# Altium PCB main_ADC_PCB.PcbDoc (part 1 of 8)
Units mm, origin at the board's own origin, x right, y up, seen from the top; angles counter-clockwise.
Board outline 150 x 100 mm, 4 copper layers (Top Layer, Layer 1, Layer 2, Bottom Layer), stack 1.62 mm thick; 535 components, 354 nets, 1725 pads, 1075 vias.
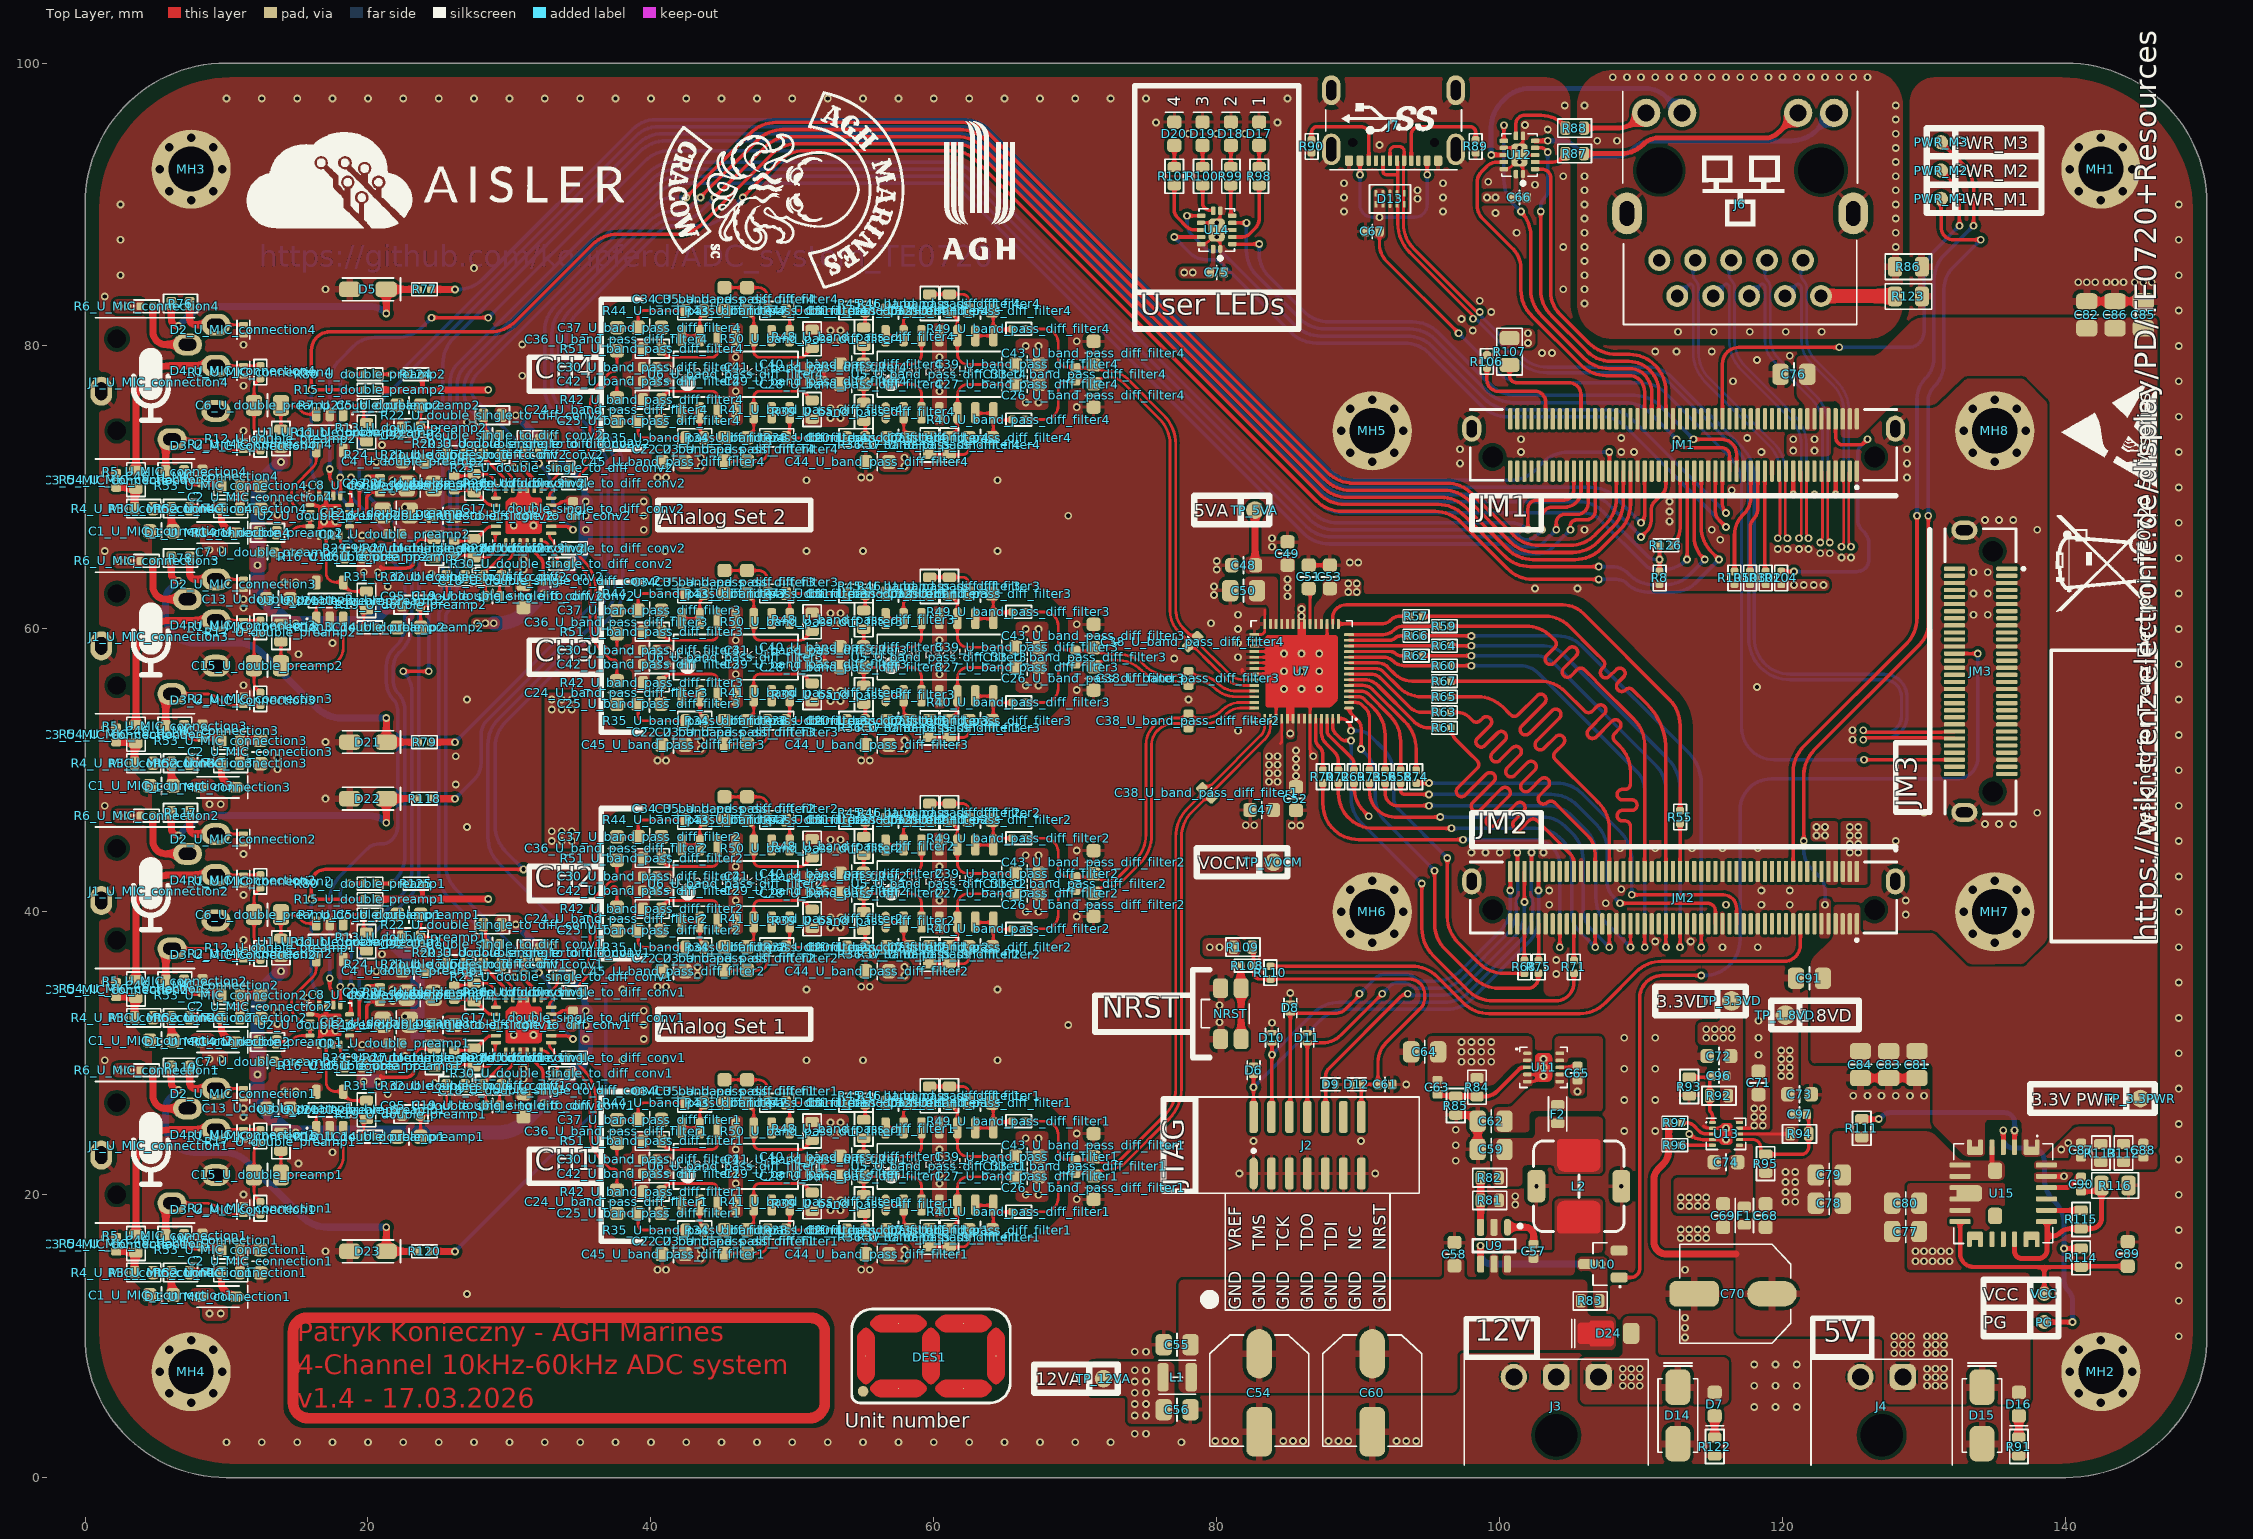
[diagram p0: Top Layer view]
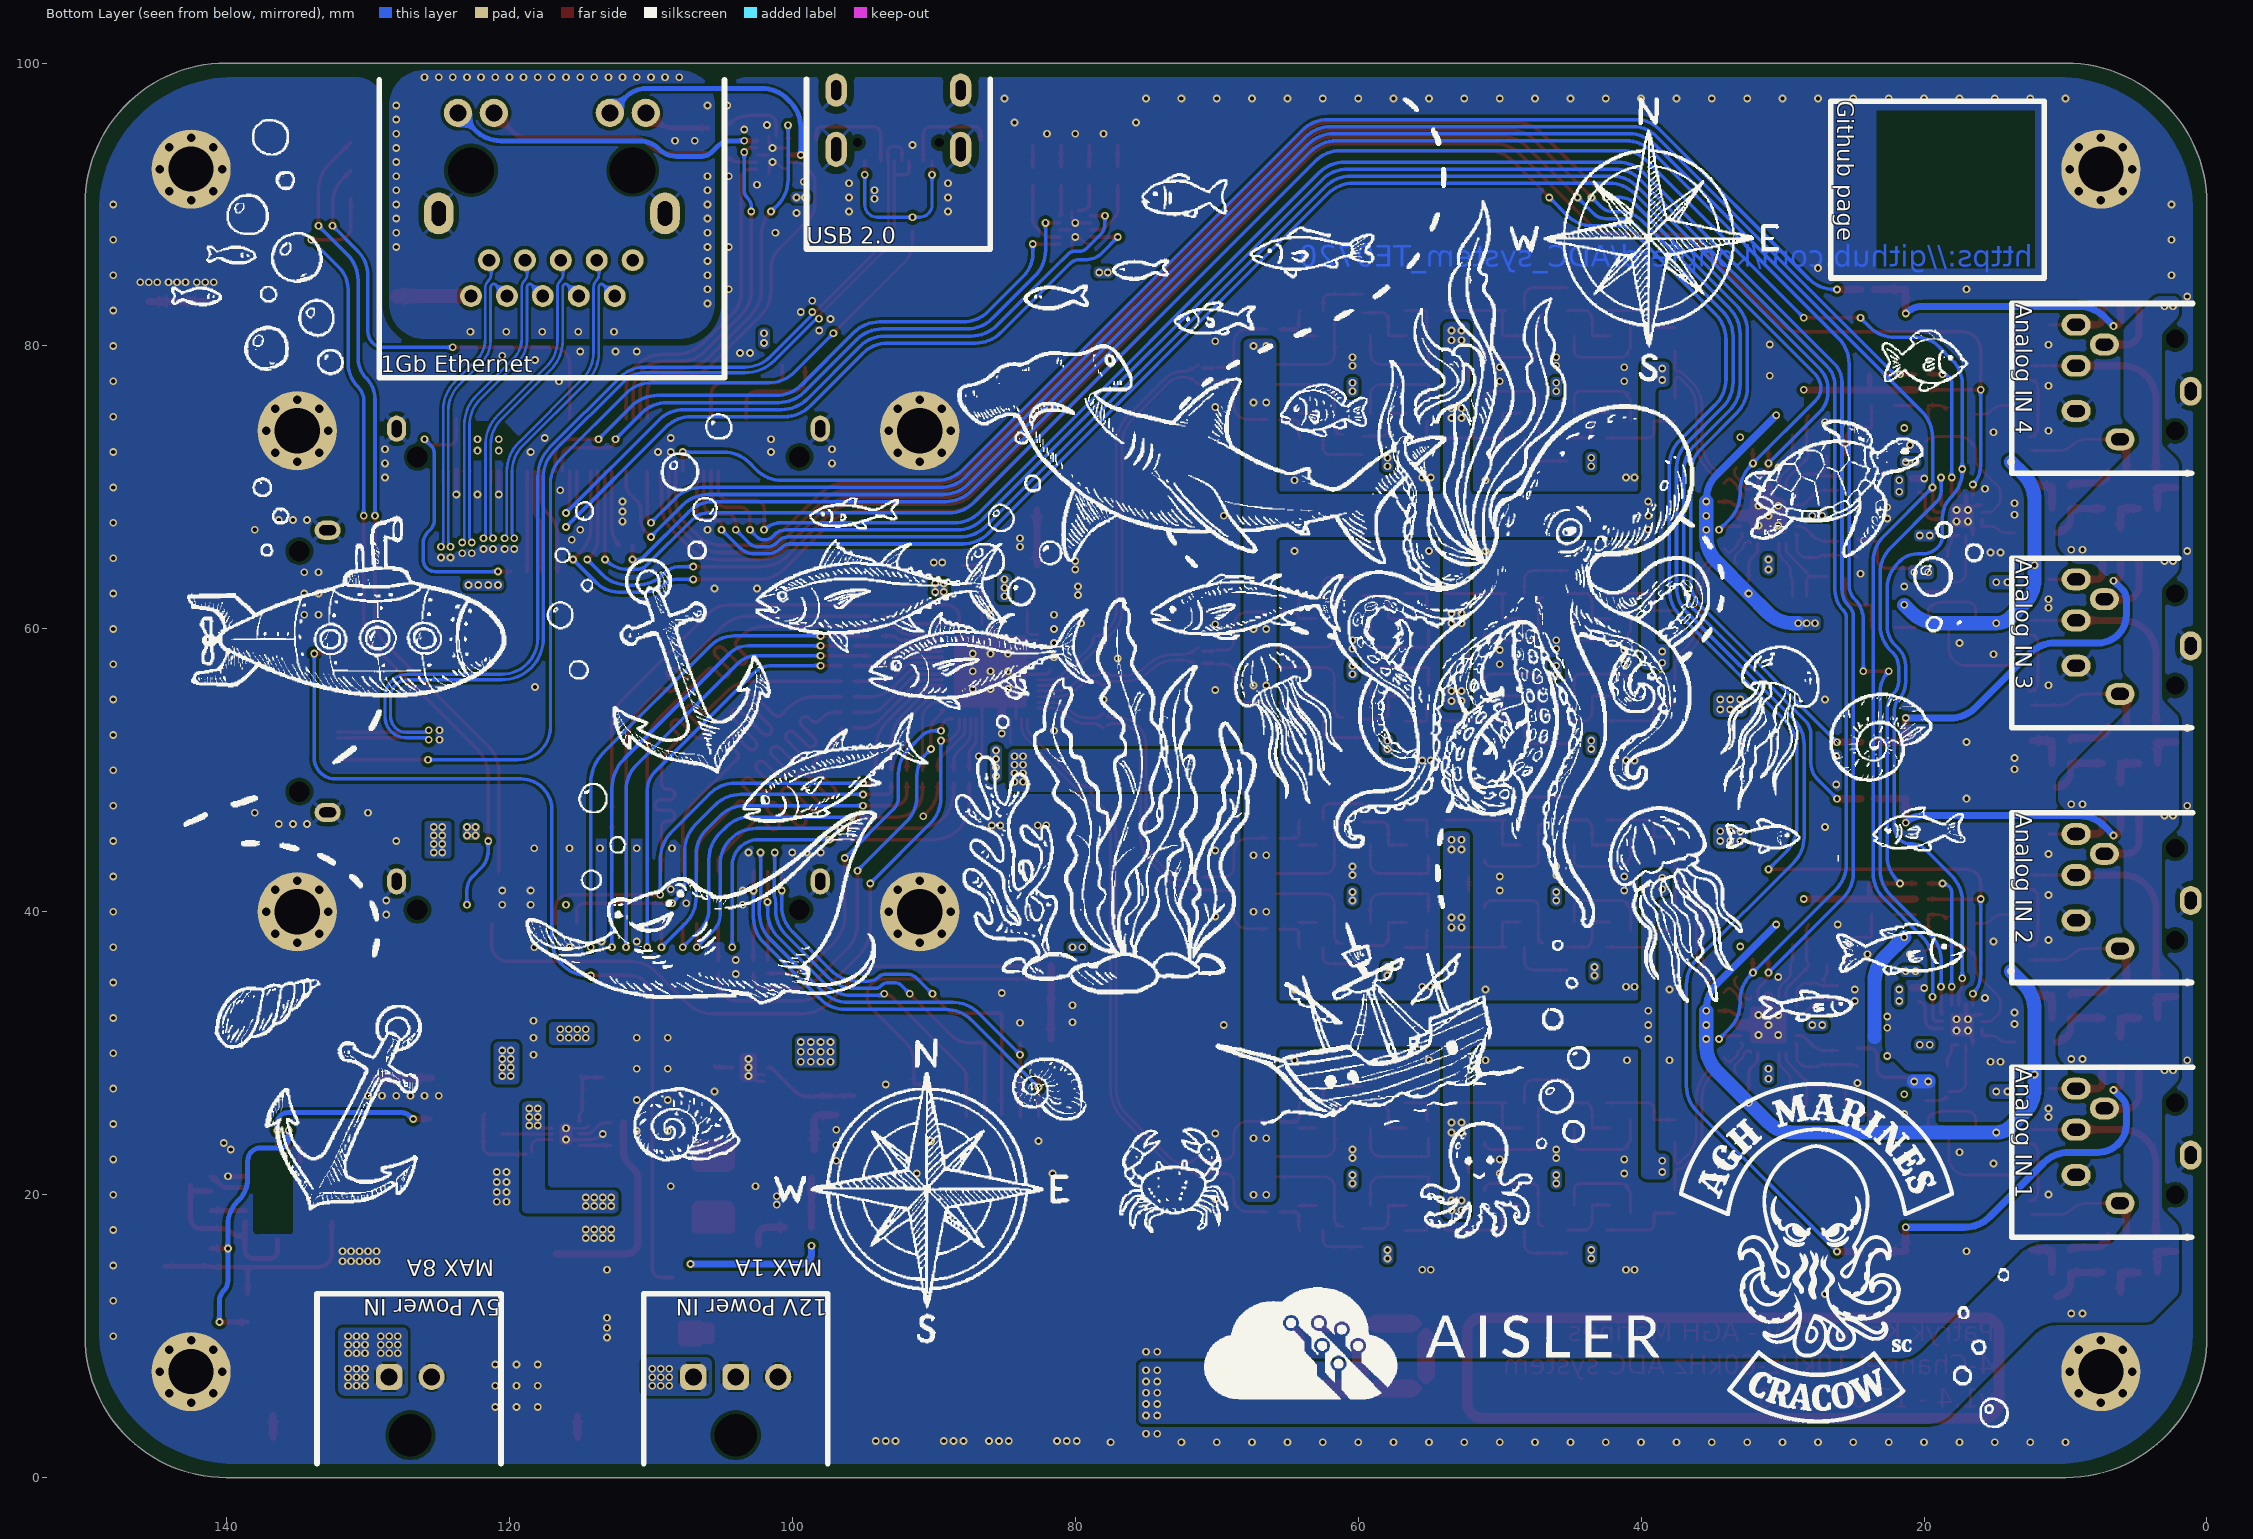
[diagram p1: Bottom Layer view, seen from below]
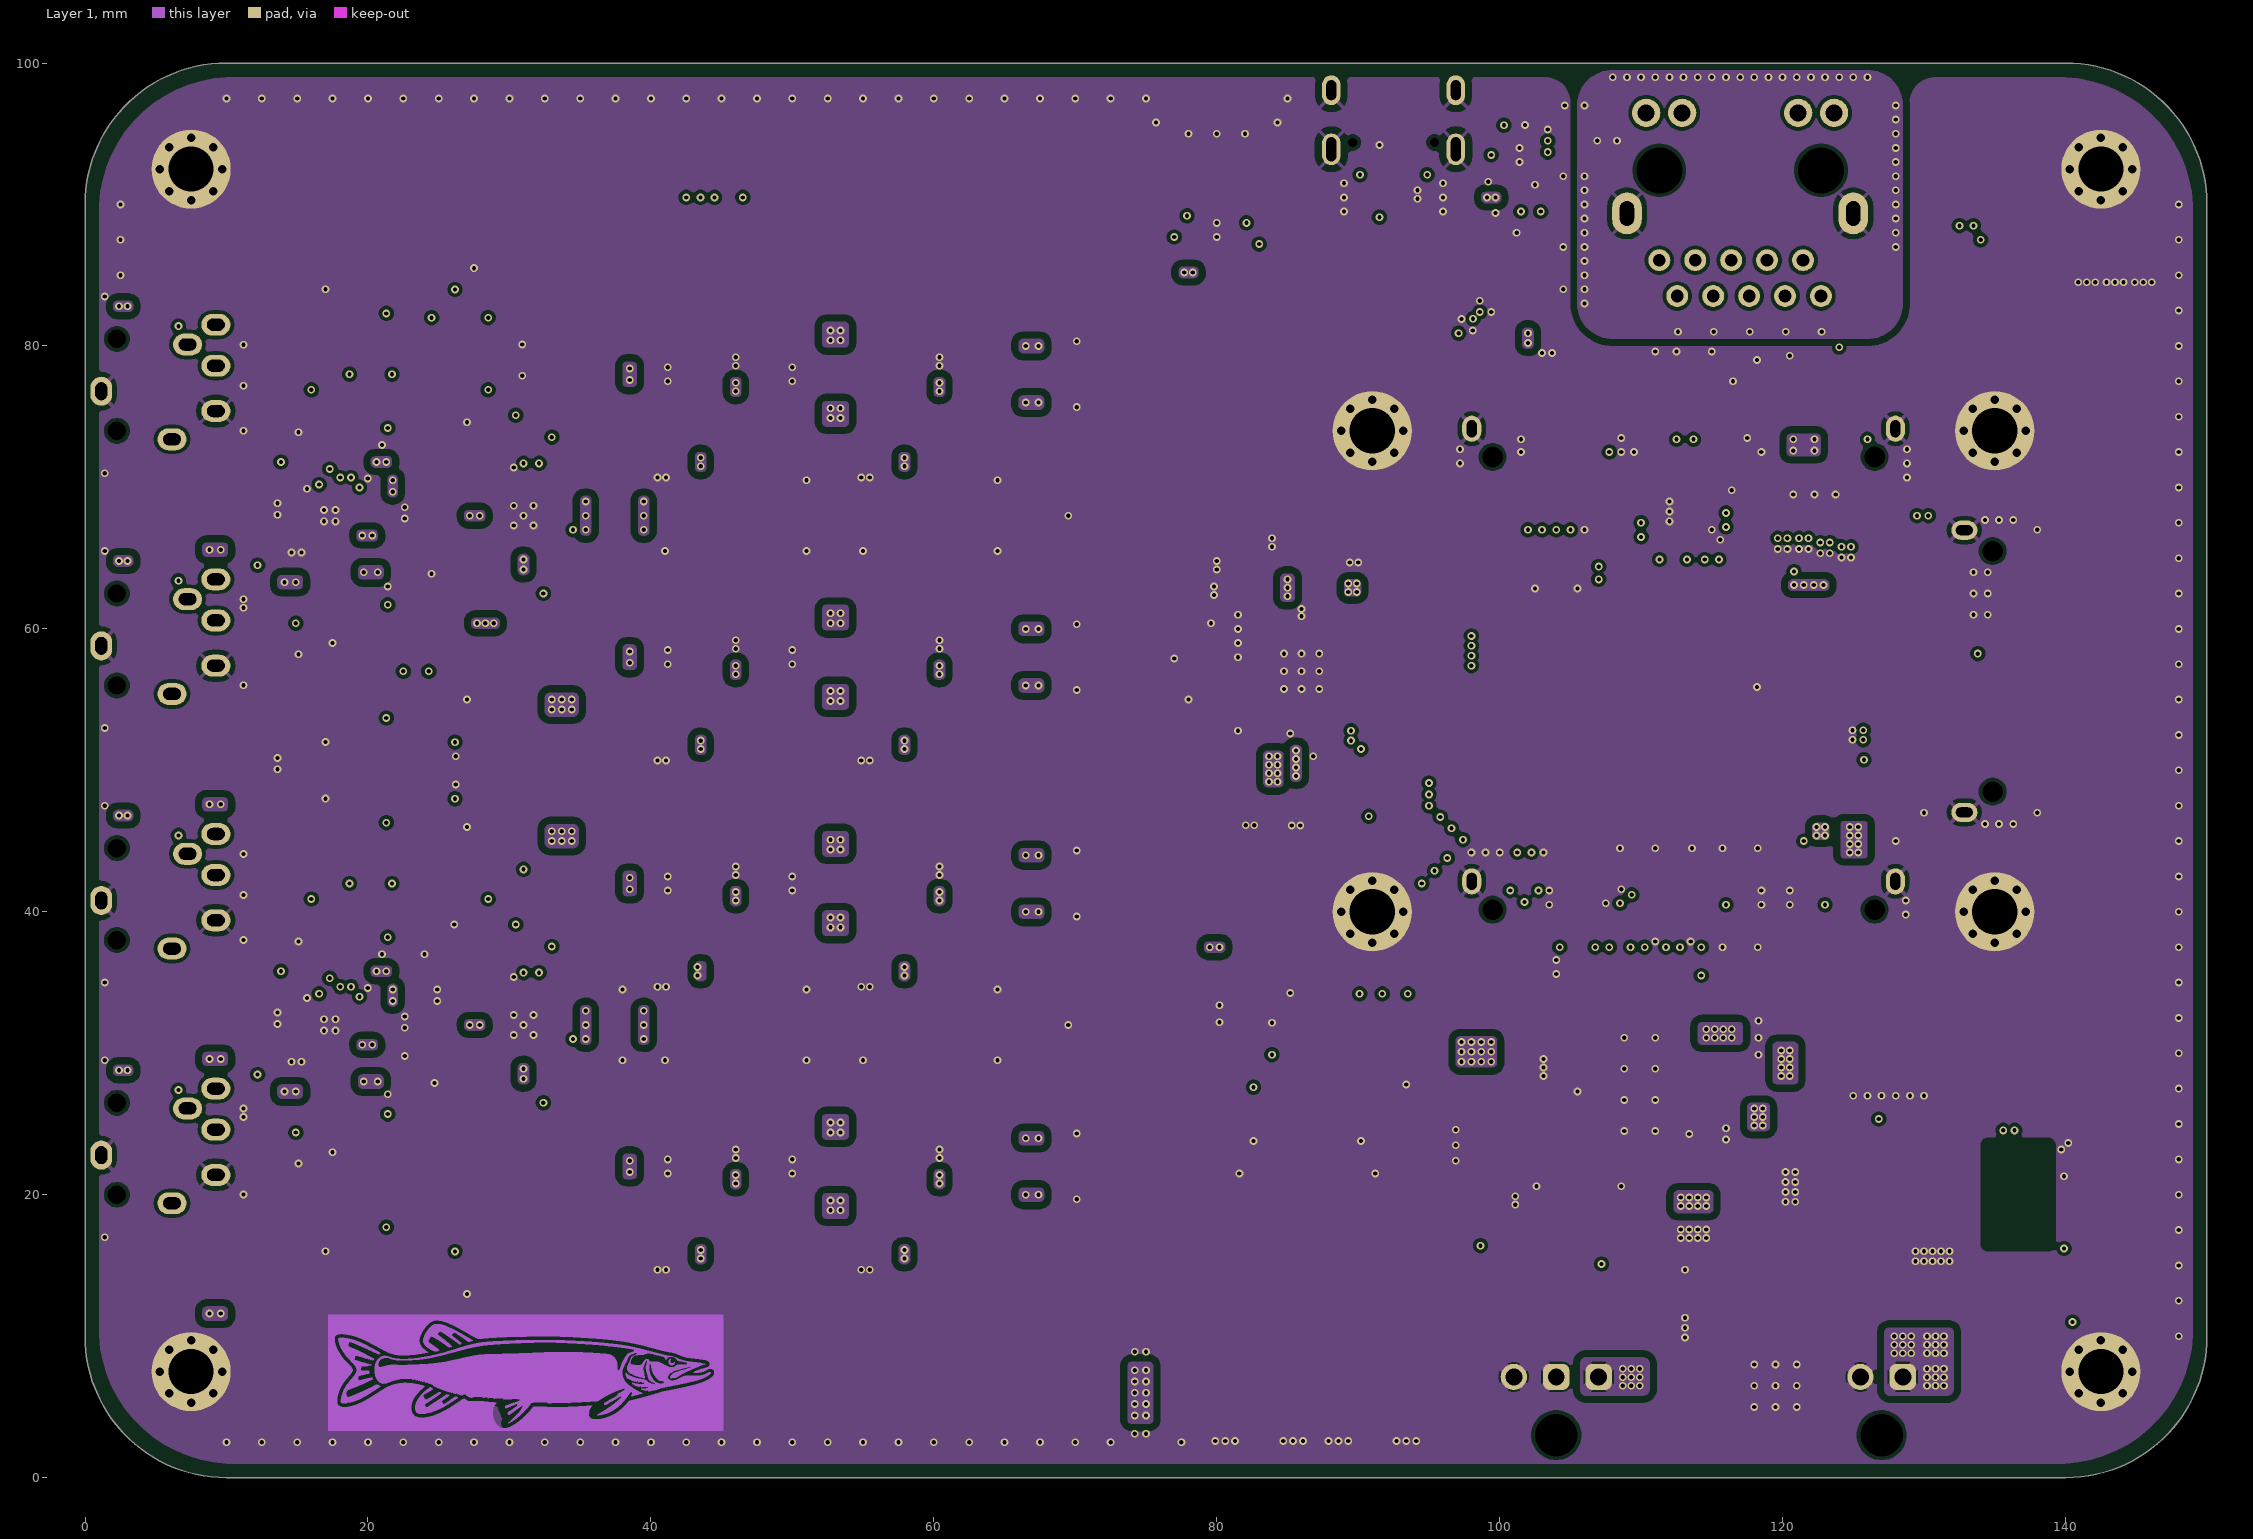
[diagram p2: Layer 1]
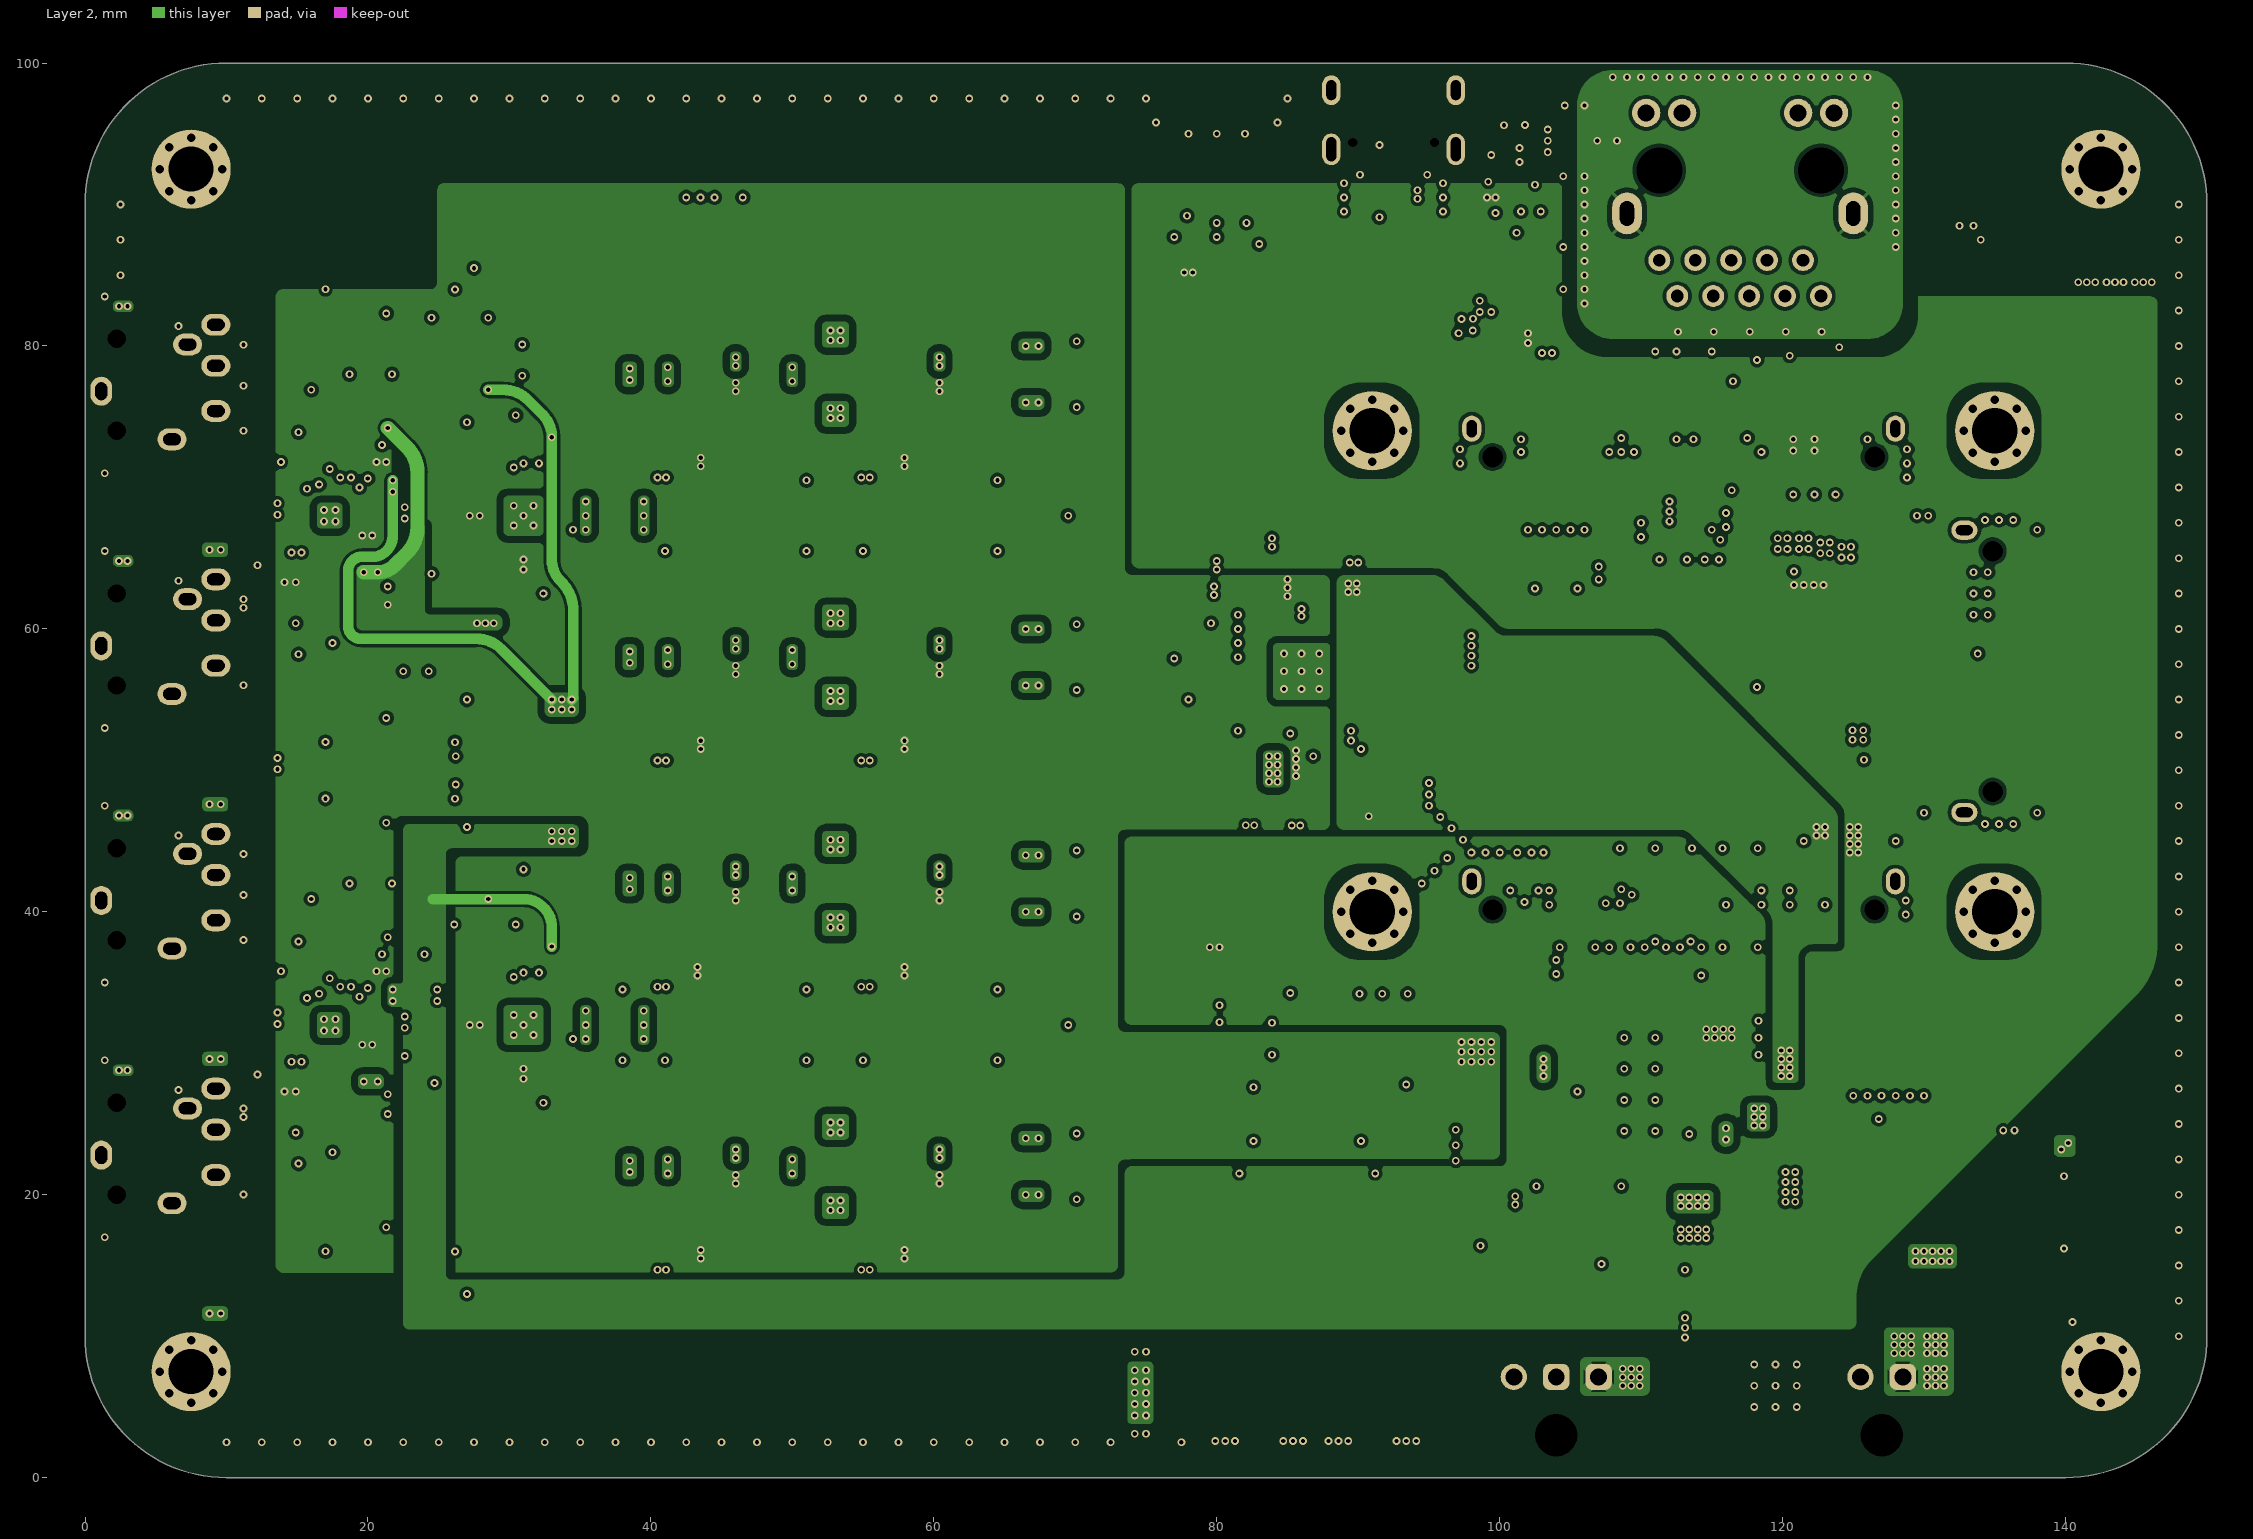
[diagram p3: Layer 2]

## Layer stack, top to bottom
Top Solder: solder mask 0.0102, Solder Resist, Dk 3.5
Top Layer: signal copper 0.035
Dielectric 3: prepreg 0.07, PP-006, Dk 4.15
Dielectric 4: prepreg 0.07, PP-006, Dk 4.15
Layer 1: signal copper 0.035
Core FR4: core 1.2, FR-4, Dk 4.6
Layer 2: signal copper 0.035
Dielectric 5: prepreg 0.07, PP-006, Dk 4.15
Dielectric 6: prepreg 0.07, PP-006, Dk 4.15
Bottom Layer: signal copper 0.035
Bottom Solder: solder mask 0.0102, Solder Resist, Dk 3.5

## Board outline
10,0 cw(c10,10) 0,10 0,90 cw(c10,90) 10,100 140,100 cw(c140,90) 150,90 150,10 cw(c140,10) 140,0

## Design rules (kind name [scope] priority, off if disabled: settings)
Clearance Clearance_1 [OnLayer('Layer 1')] p1: gap=0.125 ignorepadtopadclearanceinfootprint=TRUE except(0.2: Arc-Fill Arc-Poly Arc-Region Track-Fill Track-Poly Track-Region SMDPad-Fill SMDPad-Poly SMDPad-Region; 0.25: Arc-Hole Track-Hole SMDPad-Hole THPad-Fill THPad-Poly THPad-Region THPad-Hole Via-Fill Via-Poly Via-Region Via-Hole Fill-Hole Poly-Hole Region-Hole Text-Hole; 0.5: Fill-Fill Fill-Poly Fill-Region Poly-Poly Poly-Region Region-Region)
Clearance Clearance_2 [OnLayer('Layer 2')] p2: gap=0.125 ignorepadtopadclearanceinfootprint=TRUE except(0.2: Arc-Fill Arc-Poly Arc-Region Track-Fill Track-Poly Track-Region SMDPad-Fill SMDPad-Poly SMDPad-Region; 0.25: Arc-Hole Track-Hole SMDPad-Hole THPad-Fill THPad-Poly THPad-Region THPad-Hole Via-Fill Via-Poly Via-Region Via-Hole Fill-Hole Poly-Hole Region-Hole Text-Hole; 0.5: Fill-Fill Fill-Poly Fill-Region Poly-Poly Poly-Region Region-Region)
Clearance [All] p3: gap=0.125 ignorepadtopadclearanceinfootprint=TRUE except(0.2: Arc-Fill Arc-Poly Arc-Region Track-Fill Track-Poly Track-Region SMDPad-Fill SMDPad-Poly SMDPad-Region Fill-Fill Fill-Poly Fill-Region Poly-Poly Poly-Region Region-Region; 0.25: Arc-Hole Track-Hole SMDPad-Hole THPad-Fill THPad-Poly THPad-Region THPad-Hole Via-Fill Via-Poly Via-Region Via-Hole Fill-Hole Poly-Hole Region-Hole Text-Hole)
ComponentClearance ComponentClearance_Socket [(InComponent('JM1') OR InComponent('JM2') OR InComponent('JM3'))] p1: gap=-1 collisioncheckmode=3 verticalgap=-1 showdistances=FALSE donotcheckwithout3dbody=TRUE
ComponentClearance ComponentClearance_default [All] p2: gap=0.254 collisioncheckmode=3 verticalgap=0.254 showdistances=FALSE donotcheckwithout3dbody=TRUE
DiffPairsRouting DiffPairsRouting_90_Ohm [InDifferentialPairClass('90OhmDiff')] p1: maxlimit=0.165 minlimit=0.127 mostfreqgap=0.165 toplayer_mingap=0.165 toplayer_minwidth=0.23 toplayer_maxwidth=0.23 toplayer_prefwidth=0.23 midlayer1_maxgap=0.127 midlayer1_prefgap=0.127 midlayer1_minwidth=0.1 midlayer1_maxwidth=0.1 midlayer1_prefwidth=0.1 midlayer2_maxgap=0.127 midlayer2_prefgap=0.127 midlayer2_minwidth=0.1 midlayer2_maxwidth=0.1 midlayer2_prefwidth=0.1 bottomlayer_mingap=0.165 bottomlayer_minwidth=0.23 bottomlayer_maxwidth=0.23 bottomlayer_prefwidth=0.23 impedanceprofiledriven=TRUE impedanceprofileid={7FBF8F98-4FFD-4100-BE08-43F94D93FB27} impedanceprofilevalue=90.000000 maxuncoupledlength=12.7
DiffPairsRouting DiffPairsRouting_100_Ohm [InDifferentialPairClass('100OhmDiff')] p2: maxlimit=0.18 minlimit=0.18 mostfreqgap=0.18 toplayer_minwidth=0.19 toplayer_maxwidth=0.19 toplayer_prefwidth=0.19 midlayer1_minwidth=0.1 midlayer1_maxwidth=0.1 midlayer1_prefwidth=0.1 midlayer2_minwidth=0.1 midlayer2_maxwidth=0.1 midlayer2_prefwidth=0.1 bottomlayer_minwidth=0.19 bottomlayer_maxwidth=0.19 bottomlayer_prefwidth=0.19 impedanceprofiledriven=TRUE impedanceprofileid={1AAB0539-07C5-4944-8F13-31C4516DCF1C} impedanceprofilevalue=100.000000 maxuncoupledlength=12.7
DiffPairsRouting [All] p3: maxlimit=0.254 minlimit=0.2 mostfreqgap=0.25 toplayer_minwidth=0.15 toplayer_maxwidth=0.5 toplayer_prefwidth=0.25 midlayer1_minwidth=0.15 midlayer1_maxwidth=0.5 midlayer1_prefwidth=0.25 midlayer2_minwidth=0.15 midlayer2_maxwidth=0.5 midlayer2_prefwidth=0.25 bottomlayer_minwidth=0.15 bottomlayer_maxwidth=0.5 bottomlayer_prefwidth=0.25 maxuncoupledlength=12.7
HoleSize [All] p1: absolutevalues=TRUE maxlimit=6 minlimit=0.025 maxpercent=80.000 minpercent=20.000
HoleToHoleClearance [All] p1: gap=0.125 allowstackedmicrovias=TRUE
MatchedLengths [InxSignalClass('1Gb_Ethernet')] p1: tolerance=1 checknetsindiffpair=FALSE checkdiffpairvsdiffpair=TRUE checkxsignals=TRUE checkothers=TRUE
MatchedLengths MatchedLengths_1 [InxSignalClass('ADC_Sync_Frame')] p2: tolerance=2 checknetsindiffpair=FALSE checkdiffpairvsdiffpair=TRUE checkxsignals=TRUE checkothers=TRUE
MinimumSolderMaskSliver [All] p1: minsoldermaskwidth=0.1
PasteMaskExpansion [All] p1: expansion=-0.035
PlaneClearance [All] p1: clearance=0.5
PlaneConnect [All] p1: pad.planeconnectstyle=Relief pad.reliefexpansion=0.5 pad.reliefentries=4 pad.reliefconductorwidth=0.5 pad.reliefairgap=0.25 via.planeconnectstyle=Direct via.reliefexpansion=0.5 via.reliefentries=4 via.reliefconductorwidth=0.5 via.reliefairgap=0.25
PolygonConnect GND_pour_rule [InNamedPolygon('NONET_L03_P133')] p1: thpad.connectstyle=Relief thpad.reliefconductorwidth=0.5 thpad.reliefentries=4 thpad.polygonreliefangle="90 Angle" thpad.airgapwidth=0.25 smdpad.connectstyle=Relief smdpad.reliefconductorwidth=0.5 smdpad.reliefentries=4 smdpad.polygonreliefangle="90 Angle" smdpad.airgapwidth=0.25 via.connectstyle=Direct via.reliefconductorwidth=0.254 via.reliefentries=4 via.polygonreliefangle="90 Angle" via.airgapwidth=0.254
PolygonConnect [All] p2: thpad.connectstyle=Relief thpad.reliefconductorwidth=0.5 thpad.reliefentries=4 thpad.polygonreliefangle="45 Angle" thpad.airgapwidth=0.25 smdpad.connectstyle=Direct smdpad.reliefconductorwidth=0.5 smdpad.reliefentries=4 smdpad.polygonreliefangle="90 Angle" smdpad.airgapwidth=0.25 via.connectstyle=Direct via.reliefconductorwidth=0.254 via.reliefentries=4 via.polygonreliefangle="90 Angle" via.airgapwidth=0.254
RoutingCorners [All] p1: cornerstyle=Round minsetback=2.5 maxsetback=10
RoutingVias [All] p1: holewidth=0.3 width=0.55 viastyle="Through Hole" minholewidth=0.25 minwidth=0.45 maxholewidth=0.45 maxwidth=0.65
SilkToSilkClearance [All] p1: silktosilkclearance=-1
SilkToSolderMaskClearance [IsPad] p1: minsilkscreentomaskgap=0.125 clearancetoexposedcopper=TRUE
SolderMaskExpansion SolderMaskExpansion_Via [IsVia] p1: expansion=0.102 istentingtop=TRUE
SolderMaskExpansion [All] p2: expansion=0.05 istentingtop=FALSE
SupplyNets "Schematic Supply Nets_11" [InNet('3.3VD')] p1: voltage=0.000
SupplyNets "Schematic Supply Nets_10" [InNet('5VA')] p2: voltage=0.000
SupplyNets "Schematic Supply Nets_9" [InNet('12V_MIC')] p3: voltage=0.000
SupplyNets "Schematic Supply Nets_8" [InNet('1.8VD')] p4: voltage=0.000
SupplyNets "Schematic Supply Nets_7" [InNet('5VIN')] p5: voltage=0.000
SupplyNets "Schematic Supply Nets_6" [InNet('AGND')] p6: voltage=0.000
SupplyNets "Schematic Supply Nets_5" [InNet('VOCM')] p7: voltage=0.000
SupplyNets "Schematic Supply Nets_4" [InNet('ETH_GND')] p8: voltage=0.000
SupplyNets "Schematic Supply Nets_3" [InNet('3.3VPWR')] p9: voltage=0.000
SupplyNets "Schematic Supply Nets_2" [InNet('GND')] p10: voltage=0.000
SupplyNets "Schematic Supply Nets_1" [InNet('12VIN')] p11: voltage=0.000
SupplyNets "Schematic Supply Nets" [InNet('5VD')] p12: voltage=0.000
UnRoutedNet [All] p1: checkbadconnections=TRUE
Width Width_50_Ohm [InNetClass('50OhmSingle')] p1: maxlimit=0.245 minlimit=0.17 preferedwidth=0.245 toplayer_minwidth=0.245 midlayer1_maxwidth=0.17 midlayer1_prefwidth=0.17 midlayer2_maxwidth=0.17 midlayer2_prefwidth=0.17 bottomlayer_minwidth=0.245 impedanceprofiledriven=TRUE impedanceprofileid={6E29DB61-83AF-4A23-B0B3-436B118F7477} impedanceprofilevalue=50.000000 minimp=50.000000 maximp=50.000000 favimp=50.000000
Width Width_default [All] p2: maxlimit=2 minlimit=0.125 preferedwidth=0.25 minimp=50.000000 maximp=50.000000 favimp=50.000000
18 further rules are at their usual default settings.

## Classes and differential pairs
polygon class GND_pours: NONET_L03_P133
differential pair class 100OhmDiff: ETH_D1 ETH_D2 ETH_D3 ETH_D4
differential pair class 90OhmDiff: USB_D
channel class MIC_connection: U_MIC_connection1 U_MIC_connection2 U_MIC_connection3 U_MIC_connection4
channel class double_single_to_diff_conv: U_double_single_to_diff_conv1 U_double_single_to_diff_conv2
channel class double_preamp: U_double_preamp1 U_double_preamp2
channel class band_pass_diff_filter: U_band_pass_diff_filter1 U_band_pass_diff_filter2 U_band_pass_diff_filter3 U_band_pass_diff_filter4
net class 50OhmSingle: CLKIN CLKIN_FPGA CS CS_FPGA DCLK DCLK_FPGA DOUT0 DOUT0_FPGA DOUT1 DOUT1_FPGA DOUT2 DOUT2_FPGA DOUT3 DOUT3_FPGA ERROR ERROR_FPGA FSYNC FSYNC_FPGA IO0 IO0_FPGA IO1 IO1_FPGA IO4 IO4_FPGA IO5 IO5_FPGA IO6 IO6_FPGA IO7 IO7_FPGA JTAG_SRSTn JTAG_TCK JTAG_TDI JTAG_TDO JTAG_TMS JTAG_VREF NetJM2_17 RESET RESET_FPGA SCLK SCLK_FPGA SDI SDI_FPGA SDO SDO_FPGA START START_FPGA
component class U_USB_data: C67 D13 J7 R89 R90
component class U_switch_isolation: D5 D21 D22 D23 R76 R77 R78 R79 R117 R118 R119 R120
component class U_signal_processing_assembly: R8 R124 R125 R126
component class U_power_management: C71 C72 C73 C74 C96 C97 R92 R93 R94 R95 R96 R97 TP_1.8VD TP_3.3VD U13
component class U_Power_connectors: C68 C69 C70 D14 D15 D16 F1 J3 J4 R91
component class U_MIC_connection4: C1_U_MIC_connection4 C2_U_MIC_connection4 C3_U_MIC_connection4 C46_U_MIC_connection4 D1_U_MIC_connection4 D2_U_MIC_connection4 D3_U_MIC_connection4 D4_U_MIC_connection4 J1_U_MIC_connection4 R1_U_MIC_connection4 R2_U_MIC_connection4 R3_U_MIC_connection4 R4_U_MIC_connection4 R5_U_MIC_connection4 R6_U_MIC_connection4 R52_U_MIC_connection4 R53_U_MIC_connection4 R54_U_MIC_connection4
component class U_MIC_connection3: C1_U_MIC_connection3 C2_U_MIC_connection3 C3_U_MIC_connection3 C46_U_MIC_connection3 D1_U_MIC_connection3 D2_U_MIC_connection3 D3_U_MIC_connection3 D4_U_MIC_connection3 J1_U_MIC_connection3 R1_U_MIC_connection3 R2_U_MIC_connection3 R3_U_MIC_connection3 R4_U_MIC_connection3 R5_U_MIC_connection3 R6_U_MIC_connection3 R52_U_MIC_connection3 R53_U_MIC_connection3 R54_U_MIC_connection3
component class U_MIC_connection2: C1_U_MIC_connection2 C2_U_MIC_connection2 C3_U_MIC_connection2 C46_U_MIC_connection2 D1_U_MIC_connection2 D2_U_MIC_connection2 D3_U_MIC_connection2 D4_U_MIC_connection2 J1_U_MIC_connection2 R1_U_MIC_connection2 R2_U_MIC_connection2 R3_U_MIC_connection2 R4_U_MIC_connection2 R5_U_MIC_connection2 R6_U_MIC_connection2 R52_U_MIC_connection2 R53_U_MIC_connection2 R54_U_MIC_connection2
component class U_MIC_connection1: C1_U_MIC_connection1 C2_U_MIC_connection1 C3_U_MIC_connection1 C46_U_MIC_connection1 D1_U_MIC_connection1 D2_U_MIC_connection1 D3_U_MIC_connection1 D4_U_MIC_connection1 J1_U_MIC_connection1 R1_U_MIC_connection1 R2_U_MIC_connection1 R3_U_MIC_connection1 R4_U_MIC_connection1 R5_U_MIC_connection1 R6_U_MIC_connection1 R52_U_MIC_connection1 R53_U_MIC_connection1 R54_U_MIC_connection1
component class U_JTAG: C61 D6 D8 D9 D10 D11 D12 J2 NRST R108 R109 R110
component class U_FPGA_board_conn_pt3: JM3
component class U_FPGA_board_conn_pt2: C91 JM2 PWR_M1 PWR_M3
component class U_FPGA_board_conn_pt1: C76 JM1 PWR_M2 R102 R103 R104 R105 R106 R107
component class U_features: C75 D17 D18 D19 D20 R98 R99 R100 R101 U14
component class U_Ethernet: C66 J6 R86 R87 R88 R123 U12
component class U_double_single_to_diff_conv2: C16_U_double_single_to_diff_conv2 C17_U_double_single_to_diff_conv2 C18_U_double_single_to_diff_conv2 C19_U_double_single_to_diff_conv2 C92_U_double_single_to_diff_conv2 C93_U_double_single_to_diff_conv2 C94_U_double_single_to_diff_conv2 C95_U_double_single_to_diff_conv2 R20_U_double_single_to_diff_conv2 R21_U_double_single_to_diff_conv2 R22_U_double_single_to_diff_conv2 R23_U_double_single_to_diff_conv2 R24_U_double_single_to_diff_conv2 R25_U_double_single_to_diff_conv2 R26_U_double_single_to_diff_conv2 R27_U_double_single_to_diff_conv2 R28_U_double_single_to_diff_conv2 R29_U_double_single_to_diff_conv2 R30_U_double_single_to_diff_conv2 R31_U_double_single_to_diff_conv2 R32_U_double_single_to_diff_conv2 R33_U_double_single_to_diff_conv2 U4_U_double_single_to_diff_conv2
component class U_double_single_to_diff_conv1: C16_U_double_single_to_diff_conv1 C17_U_double_single_to_diff_conv1 C18_U_double_single_to_diff_conv1 C19_U_double_single_to_diff_conv1 C92_U_double_single_to_diff_conv1 C93_U_double_single_to_diff_conv1 C94_U_double_single_to_diff_conv1 C95_U_double_single_to_diff_conv1 R20_U_double_single_to_diff_conv1 R21_U_double_single_to_diff_conv1 R22_U_double_single_to_diff_conv1 R23_U_double_single_to_diff_conv1 R24_U_double_single_to_diff_conv1 R25_U_double_single_to_diff_conv1 R26_U_double_single_to_diff_conv1 R27_U_double_single_to_diff_conv1 R28_U_double_single_to_diff_conv1 R29_U_double_single_to_diff_conv1 R30_U_double_single_to_diff_conv1 R31_U_double_single_to_diff_conv1 R32_U_double_single_to_diff_conv1 R33_U_double_single_to_diff_conv1 U4_U_double_single_to_diff_conv1
component class U_double_preamp2: C4_U_double_preamp2 C5_U_double_preamp2 C6_U_double_preamp2 C7_U_double_preamp2 C8_U_double_preamp2 C9_U_double_preamp2 C10_U_double_preamp2 C11_U_double_preamp2 C12_U_double_preamp2 C13_U_double_preamp2 C14_U_double_preamp2 C15_U_double_preamp2 R7_U_double_preamp2 R11_U_double_preamp2 R12_U_double_preamp2 R13_U_double_preamp2 R14_U_double_preamp2 R15_U_double_preamp2 R16_U_double_preamp2 R17_U_double_preamp2 R18_U_double_preamp2 R19_U_double_preamp2 R80_U_double_preamp2 R121_U_double_preamp2 U1_U_double_preamp2 U2_U_double_preamp2 U3_U_double_preamp2
component class U_double_preamp1: C4_U_double_preamp1 C5_U_double_preamp1 C6_U_double_preamp1 C7_U_double_preamp1 C8_U_double_preamp1 C9_U_double_preamp1 C10_U_double_preamp1 C11_U_double_preamp1 C12_U_double_preamp1 C13_U_double_preamp1 C14_U_double_preamp1 C15_U_double_preamp1 R7_U_double_preamp1 R11_U_double_preamp1 R12_U_double_preamp1 R13_U_double_preamp1 R14_U_double_preamp1 R15_U_double_preamp1 R16_U_double_preamp1 R17_U_double_preamp1 R18_U_double_preamp1 R19_U_double_preamp1 R80_U_double_preamp1 R121_U_double_preamp1 U1_U_double_preamp1 U2_U_double_preamp1 U3_U_double_preamp1
component class U_Bulk_power_converter: C77 C78 C79 C80 C81 C82 C83 C84 C85 C86 C87 C88 C89 C90 PG R111 R112 R113 R114 R115 R116 TP_3.3PWR U15 VCC
component class U_band_pass_diff_filter4: C20_U_band_pass_diff_filter4 C21_U_band_pass_diff_filter4 C22_U_band_pass_diff_filter4 C23_U_band_pass_diff_filter4 C24_U_band_pass_diff_filter4 C25_U_band_pass_diff_filter4 C26_U_band_pass_diff_filter4 C27_U_band_pass_diff_filter4 C28_U_band_pass_diff_filter4 C29_U_band_pass_diff_filter4 C30_U_band_pass_diff_filter4 C31_U_band_pass_diff_filter4 C32_U_band_pass_diff_filter4 C33_U_band_pass_diff_filter4 C34_U_band_pass_diff_filter4 C35_U_band_pass_diff_filter4 C36_U_band_pass_diff_filter4 C37_U_band_pass_diff_filter4 C38_U_band_pass_diff_filter4 C39_U_band_pass_diff_filter4 C40_U_band_pass_diff_filter4 C41_U_band_pass_diff_filter4 C42_U_band_pass_diff_filter4 C43_U_band_pass_diff_filter4 C44_U_band_pass_diff_filter4 C45_U_band_pass_diff_filter4 R34_U_band_pass_diff_filter4 R35_U_band_pass_diff_filter4 R36_U_band_pass_diff_filter4 R37_U_band_pass_diff_filter4 R38_U_band_pass_diff_filter4 R39_U_band_pass_diff_filter4 R40_U_band_pass_diff_filter4 R41_U_band_pass_diff_filter4 R42_U_band_pass_diff_filter4 R43_U_band_pass_diff_filter4 R44_U_band_pass_diff_filter4 R45_U_band_pass_diff_filter4 R46_U_band_pass_diff_filter4 R47_U_band_pass_diff_filter4 R48_U_band_pass_diff_filter4 R49_U_band_pass_diff_filter4 R50_U_band_pass_diff_filter4 R51_U_band_pass_diff_filter4 U5_U_band_pass_diff_filter4 U6_U_band_pass_diff_filter4
component class U_band_pass_diff_filter3: C20_U_band_pass_diff_filter3 C21_U_band_pass_diff_filter3 C22_U_band_pass_diff_filter3 C23_U_band_pass_diff_filter3 C24_U_band_pass_diff_filter3 C25_U_band_pass_diff_filter3 C26_U_band_pass_diff_filter3 C27_U_band_pass_diff_filter3 C28_U_band_pass_diff_filter3 C29_U_band_pass_diff_filter3 C30_U_band_pass_diff_filter3 C31_U_band_pass_diff_filter3 C32_U_band_pass_diff_filter3 C33_U_band_pass_diff_filter3 C34_U_band_pass_diff_filter3 C35_U_band_pass_diff_filter3 C36_U_band_pass_diff_filter3 C37_U_band_pass_diff_filter3 C38_U_band_pass_diff_filter3 C39_U_band_pass_diff_filter3 C40_U_band_pass_diff_filter3 C41_U_band_pass_diff_filter3 C42_U_band_pass_diff_filter3 C43_U_band_pass_diff_filter3 C44_U_band_pass_diff_filter3 C45_U_band_pass_diff_filter3 R34_U_band_pass_diff_filter3 R35_U_band_pass_diff_filter3 R36_U_band_pass_diff_filter3 R37_U_band_pass_diff_filter3 R38_U_band_pass_diff_filter3 R39_U_band_pass_diff_filter3 R40_U_band_pass_diff_filter3 R41_U_band_pass_diff_filter3 R42_U_band_pass_diff_filter3 R43_U_band_pass_diff_filter3 R44_U_band_pass_diff_filter3 R45_U_band_pass_diff_filter3 R46_U_band_pass_diff_filter3 R47_U_band_pass_diff_filter3 R48_U_band_pass_diff_filter3 R49_U_band_pass_diff_filter3 R50_U_band_pass_diff_filter3 R51_U_band_pass_diff_filter3 U5_U_band_pass_diff_filter3 U6_U_band_pass_diff_filter3
component class U_band_pass_diff_filter2: C20_U_band_pass_diff_filter2 C21_U_band_pass_diff_filter2 C22_U_band_pass_diff_filter2 C23_U_band_pass_diff_filter2 C24_U_band_pass_diff_filter2 C25_U_band_pass_diff_filter2 C26_U_band_pass_diff_filter2 C27_U_band_pass_diff_filter2 C28_U_band_pass_diff_filter2 C29_U_band_pass_diff_filter2 C30_U_band_pass_diff_filter2 C31_U_band_pass_diff_filter2 C32_U_band_pass_diff_filter2 C33_U_band_pass_diff_filter2 C34_U_band_pass_diff_filter2 C35_U_band_pass_diff_filter2 C36_U_band_pass_diff_filter2 C37_U_band_pass_diff_filter2 C38_U_band_pass_diff_filter2 C39_U_band_pass_diff_filter2 C40_U_band_pass_diff_filter2 C41_U_band_pass_diff_filter2 C42_U_band_pass_diff_filter2 C43_U_band_pass_diff_filter2 C44_U_band_pass_diff_filter2 C45_U_band_pass_diff_filter2 R34_U_band_pass_diff_filter2 R35_U_band_pass_diff_filter2 R36_U_band_pass_diff_filter2 R37_U_band_pass_diff_filter2 R38_U_band_pass_diff_filter2 R39_U_band_pass_diff_filter2 R40_U_band_pass_diff_filter2 R41_U_band_pass_diff_filter2 R42_U_band_pass_diff_filter2 R43_U_band_pass_diff_filter2 R44_U_band_pass_diff_filter2 R45_U_band_pass_diff_filter2 R46_U_band_pass_diff_filter2 R47_U_band_pass_diff_filter2 R48_U_band_pass_diff_filter2 R49_U_band_pass_diff_filter2 R50_U_band_pass_diff_filter2 R51_U_band_pass_diff_filter2 U5_U_band_pass_diff_filter2 U6_U_band_pass_diff_filter2
component class U_band_pass_diff_filter1: C20_U_band_pass_diff_filter1 C21_U_band_pass_diff_filter1 C22_U_band_pass_diff_filter1 C23_U_band_pass_diff_filter1 C24_U_band_pass_diff_filter1 C25_U_band_pass_diff_filter1 C26_U_band_pass_diff_filter1 C27_U_band_pass_diff_filter1 C28_U_band_pass_diff_filter1 C29_U_band_pass_diff_filter1 C30_U_band_pass_diff_filter1 C31_U_band_pass_diff_filter1 C32_U_band_pass_diff_filter1 C33_U_band_pass_diff_filter1 C34_U_band_pass_diff_filter1 C35_U_band_pass_diff_filter1 C36_U_band_pass_diff_filter1 C37_U_band_pass_diff_filter1 C38_U_band_pass_diff_filter1 C39_U_band_pass_diff_filter1 C40_U_band_pass_diff_filter1 C41_U_band_pass_diff_filter1 C42_U_band_pass_diff_filter1 C43_U_band_pass_diff_filter1 C44_U_band_pass_diff_filter1 C45_U_band_pass_diff_filter1 R34_U_band_pass_diff_filter1 R35_U_band_pass_diff_filter1 R36_U_band_pass_diff_filter1 R37_U_band_pass_diff_filter1 R38_U_band_pass_diff_filter1 R39_U_band_pass_diff_filter1 R40_U_band_pass_diff_filter1 R41_U_band_pass_diff_filter1 R42_U_band_pass_diff_filter1 R43_U_band_pass_diff_filter1 R44_U_band_pass_diff_filter1 R45_U_band_pass_diff_filter1 R46_U_band_pass_diff_filter1 R47_U_band_pass_diff_filter1 R48_U_band_pass_diff_filter1 R49_U_band_pass_diff_filter1 R50_U_band_pass_diff_filter1 R51_U_band_pass_diff_filter1 U5_U_band_pass_diff_filter1 U6_U_band_pass_diff_filter1
component class U_analog_power: C54 C55 C56 C57 C58 C59 C60 C62 C63 C64 C65 D7 D24 F2 L1 L2 R81 R82 R83 R84 R85 R122 TP_5VA TP_12VA U9 U10 U11
component class U_ADC: C47 C48 C49 C50 C51 C52 C53 R55 R56 R57 R58 R59 R60 R61 R62 R63 R64 R65 R66 R67 R68 R69 R70 R71 R72 R73 R74 R75 TP_VOCM U7
component class top_assembly: DES1 MH1 MH2 MH3 MH4 MH5 MH6 MH7 MH8
differential pair USB_D: +USB_D_P -USB_D_N
differential pair MIC_FILTER_OUT_U_band_pass_diff_filter4: +MIC_FILTER_OUT_U_band_pass_diff_filter4_P -MIC_FILTER_OUT_U_band_pass_diff_filter4_N
differential pair MIC_FILTER_OUT_U_band_pass_diff_filter3: +MIC_FILTER_OUT_U_band_pass_diff_filter3_P -MIC_FILTER_OUT_U_band_pass_diff_filter3_N
differential pair MIC_FILTER_OUT_U_band_pass_diff_filter2: +MIC_FILTER_OUT_U_band_pass_diff_filter2_P -MIC_FILTER_OUT_U_band_pass_diff_filter2_N
differential pair MIC_FILTER_OUT_U_band_pass_diff_filter1: +MIC_FILTER_OUT_U_band_pass_diff_filter1_P -MIC_FILTER_OUT_U_band_pass_diff_filter1_N
differential pair MIC2_DIFF_U_double_single_to_diff_conv2: +MIC2_DIFF_U_double_single_to_diff_conv2_P -MIC2_DIFF_U_double_single_to_diff_conv2_N
differential pair MIC2_DIFF_U_double_single_to_diff_conv1: +MIC2_DIFF_U_double_single_to_diff_conv1_P -MIC2_DIFF_U_double_single_to_diff_conv1_N
differential pair MIC2_DIFF_R_U_double_single_to_diff_conv2: +MIC2_DIFF_R_U_double_single_to_diff_conv2_P -MIC2_DIFF_R_U_double_single_to_diff_conv2_N
differential pair MIC2_DIFF_R_U_double_single_to_diff_conv1: +MIC2_DIFF_R_U_double_single_to_diff_conv1_P -MIC2_DIFF_R_U_double_single_to_diff_conv1_N
differential pair MIC1_DIFF_U_double_single_to_diff_conv2: +MIC1_DIFF_U_double_single_to_diff_conv2_P -MIC1_DIFF_U_double_single_to_diff_conv2_N
differential pair MIC1_DIFF_U_double_single_to_diff_conv1: +MIC1_DIFF_U_double_single_to_diff_conv1_P -MIC1_DIFF_U_double_single_to_diff_conv1_N
differential pair MIC1_DIFF_R_U_double_single_to_diff_conv2: +MIC1_DIFF_R_U_double_single_to_diff_conv2_P -MIC1_DIFF_R_U_double_single_to_diff_conv2_N
differential pair MIC1_DIFF_R_U_double_single_to_diff_conv1: +MIC1_DIFF_R_U_double_single_to_diff_conv1_P -MIC1_DIFF_R_U_double_single_to_diff_conv1_N
differential pair ETH_D4: +ETH_D4_P -ETH_D4_N
differential pair ETH_D3: +ETH_D3_P -ETH_D3_N
differential pair ETH_D2: +ETH_D2_P -ETH_D2_N
differential pair ETH_D1: +ETH_D1_P -ETH_D1_N

## Components (designator, comment, footprint, x,y, rotation, side; value= is the part's Value field where it differs from the comment)
C1_U_MIC_connection1 "CC0603JRX7R7BB105" CAPC_0603#1 5.4,12.9 r0 top value=1uF (schematic designator C1)
C1_U_MIC_connection2 "CC0603JRX7R7BB105" CAPC_0603#1 5.4,30.9 r0 top value=1uF (schematic designator C1)
C1_U_MIC_connection3 "CC0603JRX7R7BB105" CAPC_0603#1 5.4,48.9 r0 top value=1uF (schematic designator C1)
C1_U_MIC_connection4 "CC0603JRX7R7BB105" CAPC_0603#1 5.4,66.9 r0 top value=1uF (schematic designator C1)
C2_U_MIC_connection1 "CC0603JRX7R7BB105" CAPC_0603#1 12.4,15.3 r90 top value=1uF (schematic designator C2)
C2_U_MIC_connection2 "CC0603JRX7R7BB105" CAPC_0603#1 12.4,33.3 r90 top value=1uF (schematic designator C2)
C2_U_MIC_connection3 "CC0603JRX7R7BB105" CAPC_0603#1 12.4,51.3 r90 top value=1uF (schematic designator C2)
C2_U_MIC_connection4 "CC0603JRX7R7BB105" CAPC_0603#1 12.4,69.3 r90 top value=1uF (schematic designator C2)
C3_U_MIC_connection1 "KGM05ACG1H101FH" CAPC_0402 2.2,16.5 r90 top value=100pF (schematic designator C3)
C3_U_MIC_connection2 "KGM05ACG1H101FH" CAPC_0402 2.2,34.5 r90 top value=100pF (schematic designator C3)
C3_U_MIC_connection3 "KGM05ACG1H101FH" CAPC_0402 2.2,52.5 r90 top value=100pF (schematic designator C3)
C3_U_MIC_connection4 "KGM05ACG1H101FH" CAPC_0402 2.2,70.5 r90 top value=100pF (schematic designator C3)
C4_U_double_preamp1 "CC0603JRX7R7BB105" CAPC_0603#1 23.252,35.85 r0 top value=1uF (schematic designator C4)
C4_U_double_preamp2 "CC0603JRX7R7BB105" CAPC_0603#1 23.252,71.85 r0 top value=1uF (schematic designator C4)
C5_U_double_preamp1 "CC0603JRX7R7BB105" CAPC_0603#1 22.9,39.8 r180 top value=1uF (schematic designator C5)
C5_U_double_preamp2 "CC0603JRX7R7BB105" CAPC_0603#1 22.9,75.8 r180 top value=1uF (schematic designator C5)
C6_U_double_preamp1 "EMK212BJ106KG-T" CAPC_0805 12.9,39.8 r180 top value=10uF (schematic designator C6)
C6_U_double_preamp2 "EMK212BJ106KG-T" CAPC_0805 12.9,75.8 r180 top value=10uF (schematic designator C6)
C7_U_double_preamp1 "MSAST105SB5104MFNA01" CAPC_0402 12.9,29.4 r0 top value=0.1uF (schematic designator C7)
C7_U_double_preamp2 "MSAST105SB5104MFNA01" CAPC_0402 12.9,65.4 r0 top value=0.1uF (schematic designator C7)
C8_U_double_preamp1 "MSAST105SB5104MFNA01" CAPC_0402 20.852,34.15 r270 top value=0.1uF (schematic designator C8)
C8_U_double_preamp2 "MSAST105SB5104MFNA01" CAPC_0402 20.852,70.15 r270 top value=0.1uF (schematic designator C8)
C9_U_double_preamp1 "EMK212BJ106KG-T" CAPC_0805 23.7,34.1 r180 top value=10uF (schematic designator C9)
C9_U_double_preamp2 "EMK212BJ106KG-T" CAPC_0805 23.7,70.1 r180 top value=10uF (schematic designator C9)
C10_U_double_preamp1 "MSAST105SB5104MFNA01" CAPC_0402 21.3,29.1 r0 top value=0.1uF (schematic designator C10)
C10_U_double_preamp2 "MSAST105SB5104MFNA01" CAPC_0402 21.3,65.1 r0 top value=0.1uF (schematic designator C10)
C11_U_double_preamp1 "MSAST105SB5104MFNA01" CAPC_0402 21.9,30.7 r0 top value=0.1uF (schematic designator C11)
C11_U_double_preamp2 "MSAST105SB5104MFNA01" CAPC_0402 21.9,66.7 r0 top value=0.1uF (schematic designator C11)
C12_U_double_preamp1 "EMK212BJ106KG-T" CAPC_0805 22,32.2 r0 top value=10uF (schematic designator C12)
C12_U_double_preamp2 "EMK212BJ106KG-T" CAPC_0805 22,68.2 r0 top value=10uF (schematic designator C12)
C13_U_double_preamp1 "CC0603JRX7R7BB105" CAPC_0603#1 13.675,26.1 r180 top value=1uF (schematic designator C13)
C13_U_double_preamp2 "CC0603JRX7R7BB105" CAPC_0603#1 13.675,62.1 r180 top value=1uF (schematic designator C13)
C14_U_double_preamp1 "CC0603JRX7R7BB105" CAPC_0603#1 22.9,24.1 r180 top value=1uF (schematic designator C14)
C14_U_double_preamp2 "CC0603JRX7R7BB105" CAPC_0603#1 22.9,60.1 r180 top value=1uF (schematic designator C14)
C15_U_double_preamp1 "EMK212BJ106KG-T" CAPC_0805 12.9,21.4 r180 top value=10uF (schematic designator C15)
C15_U_double_preamp2 "EMK212BJ106KG-T" CAPC_0805 12.9,57.4 r180 top value=10uF (schematic designator C15)
C16_U_double_single_to_diff_conv1 "CC0603JRX7R7BB105" CAPC_0603#1 25.3,32 r0 top value=1uF (schematic designator C16)
C16_U_double_single_to_diff_conv2 "CC0603JRX7R7BB105" CAPC_0603#1 25.3,68 r0 top value=1uF (schematic designator C16)
C17_U_double_single_to_diff_conv1 "MSAST105SB5104MFNA01" CAPC_0402 34.5,32.5 r90 top value=0.1uF (schematic designator C17)
C17_U_double_single_to_diff_conv2 "MSAST105SB5104MFNA01" CAPC_0402 34.5,68.5 r90 top value=0.1uF (schematic designator C17)
C18_U_double_single_to_diff_conv1 "MSAST105SB5104MFNA01" CAPC_0402 32.9,27.4 r0 top value=0.1uF (schematic designator C18)
C18_U_double_single_to_diff_conv2 "MSAST105SB5104MFNA01" CAPC_0402 32.9,63.4 r0 top value=0.1uF (schematic designator C18)
C19_U_double_single_to_diff_conv1 "CC0603JRX7R7BB105" CAPC_0603#1 31,26.325 r270 top value=1uF (schematic designator C19)
C19_U_double_single_to_diff_conv2 "CC0603JRX7R7BB105" CAPC_0603#1 31,62.325 r270 top value=1uF (schematic designator C19)
C20_U_band_pass_diff_filter1 "C0402C221J3GACTU" CAPC_0603#1 57.5,17.5 r0 top value=200pF (schematic designator C20)
C20_U_band_pass_diff_filter2 "C0402C221J3GACTU" CAPC_0603#1 57.5,37.5 r0 top value=200pF (schematic designator C20)
C20_U_band_pass_diff_filter3 "C0402C221J3GACTU" CAPC_0603#1 57.5,53.5 r0 top value=200pF (schematic designator C20)
C20_U_band_pass_diff_filter4 "C0402C221J3GACTU" CAPC_0603#1 57.5,73.5 r0 top value=200pF (schematic designator C20)
C21_U_band_pass_diff_filter1 "C0402C221J3GACTU" CAPC_0603#1 63.3,17.5 r0 top value=200pF (schematic designator C21)
C21_U_band_pass_diff_filter2 "C0402C221J3GACTU" CAPC_0603#1 63.3,37.5 r0 top value=200pF (schematic designator C21)
C21_U_band_pass_diff_filter3 "C0402C221J3GACTU" CAPC_0603#1 63.3,53.5 r0 top value=200pF (schematic designator C21)
C21_U_band_pass_diff_filter4 "C0402C221J3GACTU" CAPC_0603#1 63.3,73.5 r0 top value=200pF (schematic designator C21)
C22_U_band_pass_diff_filter1 "C0603C153G4GACTU" CAPC_0603#1 45.2,16.7 r90 top value=1nF (schematic designator C22)
C22_U_band_pass_diff_filter2 "C0603C153G4GACTU" CAPC_0603#1 45.2,36.7 r90 top value=1nF (schematic designator C22)
C22_U_band_pass_diff_filter3 "C0603C153G4GACTU" CAPC_0603#1 45.2,52.7 r90 top value=1nF (schematic designator C22)
C22_U_band_pass_diff_filter4 "C0603C153G4GACTU" CAPC_0603#1 45.2,72.7 r90 top value=1nF (schematic designator C22)
C23_U_band_pass_diff_filter1 "C0603C153G4GACTU" CAPC_0603#1 46.8,16.7 r270 top value=1nF (schematic designator C23)
C23_U_band_pass_diff_filter2 "C0603C153G4GACTU" CAPC_0603#1 46.8,36.7 r270 top value=1nF (schematic designator C23)
C23_U_band_pass_diff_filter3 "C0603C153G4GACTU" CAPC_0603#1 46.8,52.7 r270 top value=1nF (schematic designator C23)
C23_U_band_pass_diff_filter4 "C0603C153G4GACTU" CAPC_0603#1 46.8,72.7 r270 top value=1nF (schematic designator C23)
C24_U_band_pass_diff_filter1 "C0603C153G4GACTU" CAPC_0603#1 37.6,19.5 r90 top value=1nF (schematic designator C24)
C24_U_band_pass_diff_filter2 "C0603C153G4GACTU" CAPC_0603#1 37.6,39.5 r90 top value=1nF (schematic designator C24)
C24_U_band_pass_diff_filter3 "C0603C153G4GACTU" CAPC_0603#1 37.6,55.5 r90 top value=1nF (schematic designator C24)
C24_U_band_pass_diff_filter4 "C0603C153G4GACTU" CAPC_0603#1 37.6,75.5 r90 top value=1nF (schematic designator C24)
C25_U_band_pass_diff_filter1 "C0603C153G4GACTU" CAPC_0603#1 39.9,18.7 r180 top value=1nF (schematic designator C25)
C25_U_band_pass_diff_filter2 "C0603C153G4GACTU" CAPC_0603#1 39.9,38.7 r180 top value=1nF (schematic designator C25)
C25_U_band_pass_diff_filter3 "C0603C153G4GACTU" CAPC_0603#1 39.9,54.7 r180 top value=1nF (schematic designator C25)
C25_U_band_pass_diff_filter4 "C0603C153G4GACTU" CAPC_0603#1 39.9,74.7 r180 top value=1nF (schematic designator C25)
C26_U_band_pass_diff_filter1 "C0402C221J3GACTU" CAPC_0603#1 71.3,20.5 r90 top value=200pF (schematic designator C26)
C26_U_band_pass_diff_filter2 "C0402C221J3GACTU" CAPC_0603#1 71.3,40.5 r90 top value=200pF (schematic designator C26)
C26_U_band_pass_diff_filter3 "C0402C221J3GACTU" CAPC_0603#1 71.3,56.5 r90 top value=200pF (schematic designator C26)
C26_U_band_pass_diff_filter4 "C0402C221J3GACTU" CAPC_0603#1 71.3,76.5 r90 top value=200pF (schematic designator C26)
C27_U_band_pass_diff_filter1 "KGM15ACG1H150FT" CAPC_0603#1 66.6,21.3 r0 top value=15pF (schematic designator C27)
C27_U_band_pass_diff_filter2 "KGM15ACG1H150FT" CAPC_0603#1 66.6,41.3 r0 top value=15pF (schematic designator C27)
C27_U_band_pass_diff_filter3 "KGM15ACG1H150FT" CAPC_0603#1 66.6,57.3 r0 top value=15pF (schematic designator C27)
C27_U_band_pass_diff_filter4 "KGM15ACG1H150FT" CAPC_0603#1 66.6,77.3 r0 top value=15pF (schematic designator C27)
C28_U_band_pass_diff_filter1 "C0603C131F5GACTU" CAPC_0603#1 54.2,21.3 r180 top value=130pF (schematic designator C28)
C28_U_band_pass_diff_filter2 "C0603C131F5GACTU" CAPC_0603#1 54.2,41.3 r180 top value=130pF (schematic designator C28)
C28_U_band_pass_diff_filter3 "C0603C131F5GACTU" CAPC_0603#1 54.2,57.3 r180 top value=130pF (schematic designator C28)
C28_U_band_pass_diff_filter4 "C0603C131F5GACTU" CAPC_0603#1 54.2,77.3 r180 top value=130pF (schematic designator C28)
C29_U_band_pass_diff_filter1 "MSAST105SB5104MFNA01" CAPC_0402 51.7,21.5 r180 top value=0.1uF (schematic designator C29)
C29_U_band_pass_diff_filter2 "MSAST105SB5104MFNA01" CAPC_0402 51.7,41.5 r180 top value=0.1uF (schematic designator C29)
C29_U_band_pass_diff_filter3 "MSAST105SB5104MFNA01" CAPC_0402 51.7,57.5 r180 top value=0.1uF (schematic designator C29)
C29_U_band_pass_diff_filter4 "MSAST105SB5104MFNA01" CAPC_0402 51.7,77.5 r180 top value=0.1uF (schematic designator C29)
C30_U_band_pass_diff_filter1 "MSAST105SB5104MFNA01" CAPC_0402 39.9,22.5 r0 top value=0.1uF (schematic designator C30)
C30_U_band_pass_diff_filter2 "MSAST105SB5104MFNA01" CAPC_0402 39.9,42.5 r0 top value=0.1uF (schematic designator C30)
C30_U_band_pass_diff_filter3 "MSAST105SB5104MFNA01" CAPC_0402 39.9,58.5 r0 top value=0.1uF (schematic designator C30)
C30_U_band_pass_diff_filter4 "MSAST105SB5104MFNA01" CAPC_0402 39.9,78.5 r0 top value=0.1uF (schematic designator C30)
C31_U_band_pass_diff_filter1 "C0402C221J3GACTU" CAPC_0603#1 57.5,26.5 r0 top value=200pF (schematic designator C31)
C31_U_band_pass_diff_filter2 "C0402C221J3GACTU" CAPC_0603#1 57.5,46.5 r0 top value=200pF (schematic designator C31)
C31_U_band_pass_diff_filter3 "C0402C221J3GACTU" CAPC_0603#1 57.5,62.5 r0 top value=200pF (schematic designator C31)
C31_U_band_pass_diff_filter4 "C0402C221J3GACTU" CAPC_0603#1 57.5,82.5 r0 top value=200pF (schematic designator C31)
C32_U_band_pass_diff_filter1 "C0402C221J3GACTU" CAPC_0603#1 63.3,26.5 r0 top value=200pF (schematic designator C32)
C32_U_band_pass_diff_filter2 "C0402C221J3GACTU" CAPC_0603#1 63.3,46.5 r0 top value=200pF (schematic designator C32)
C32_U_band_pass_diff_filter3 "C0402C221J3GACTU" CAPC_0603#1 63.3,62.5 r0 top value=200pF (schematic designator C32)
C32_U_band_pass_diff_filter4 "C0402C221J3GACTU" CAPC_0603#1 63.3,82.5 r0 top value=200pF (schematic designator C32)
C33_U_band_pass_diff_filter1 "C0402C222J3GACTU" CAPC_0402 70,22 r270 top value=2.2nF (schematic designator C33)
C33_U_band_pass_diff_filter2 "C0402C222J3GACTU" CAPC_0402 70,42 r270 top value=2.2nF (schematic designator C33)
C33_U_band_pass_diff_filter3 "C0402C222J3GACTU" CAPC_0402 70,58 r270 top value=2.2nF (schematic designator C33)
C33_U_band_pass_diff_filter4 "C0402C222J3GACTU" CAPC_0402 70,78 r270 top value=2.2nF (schematic designator C33)
C34_U_band_pass_diff_filter1 "C0603C153G4GACTU" CAPC_0603#1 45.2,27.3 r270 top value=1nF (schematic designator C34)
C34_U_band_pass_diff_filter2 "C0603C153G4GACTU" CAPC_0603#1 45.2,47.3 r270 top value=1nF (schematic designator C34)
C34_U_band_pass_diff_filter3 "C0603C153G4GACTU" CAPC_0603#1 45.2,63.3 r270 top value=1nF (schematic designator C34)
C34_U_band_pass_diff_filter4 "C0603C153G4GACTU" CAPC_0603#1 45.2,83.3 r270 top value=1nF (schematic designator C34)
C35_U_band_pass_diff_filter1 "C0603C153G4GACTU" CAPC_0603#1 46.8,27.3 r90 top value=1nF (schematic designator C35)
C35_U_band_pass_diff_filter2 "C0603C153G4GACTU" CAPC_0603#1 46.8,47.3 r90 top value=1nF (schematic designator C35)
C35_U_band_pass_diff_filter3 "C0603C153G4GACTU" CAPC_0603#1 46.8,63.3 r90 top value=1nF (schematic designator C35)
C35_U_band_pass_diff_filter4 "C0603C153G4GACTU" CAPC_0603#1 46.8,83.3 r90 top value=1nF (schematic designator C35)
C36_U_band_pass_diff_filter1 "C0603C153G4GACTU" CAPC_0603#1 37.6,24.475 r270 top value=1nF (schematic designator C36)
C36_U_band_pass_diff_filter2 "C0603C153G4GACTU" CAPC_0603#1 37.6,44.475 r270 top value=1nF (schematic designator C36)
C36_U_band_pass_diff_filter3 "C0603C153G4GACTU" CAPC_0603#1 37.6,60.475 r270 top value=1nF (schematic designator C36)
C36_U_band_pass_diff_filter4 "C0603C153G4GACTU" CAPC_0603#1 37.6,80.475 r270 top value=1nF (schematic designator C36)
C37_U_band_pass_diff_filter1 "C0603C153G4GACTU" CAPC_0603#1 39.925,25.3 r180 top value=1nF (schematic designator C37)
C37_U_band_pass_diff_filter2 "C0603C153G4GACTU" CAPC_0603#1 39.925,45.3 r180 top value=1nF (schematic designator C37)
C37_U_band_pass_diff_filter3 "C0603C153G4GACTU" CAPC_0603#1 39.925,61.3 r180 top value=1nF (schematic designator C37)
C37_U_band_pass_diff_filter4 "C0603C153G4GACTU" CAPC_0603#1 39.925,81.3 r180 top value=1nF (schematic designator C37)
C38_U_band_pass_diff_filter1 "C0402C222J3GACTU" CAPC_0402 79.3,48.4 r315 top value=2.2nF (schematic designator C38)
C38_U_band_pass_diff_filter2 "C0402C222J3GACTU" CAPC_0402 78,53.5 r270 top value=2.2nF (schematic designator C38)
C38_U_band_pass_diff_filter3 "C0402C222J3GACTU" CAPC_0402 78,56.5 r270 top value=2.2nF (schematic designator C38)
C38_U_band_pass_diff_filter4 "C0402C222J3GACTU" CAPC_0402 78.3,59.1 r225 top value=2.2nF (schematic designator C38)
C39_U_band_pass_diff_filter1 "KGM15ACG1H150FT" CAPC_0603#1 66.6,22.7 r0 top value=15pF (schematic designator C39)
C39_U_band_pass_diff_filter2 "KGM15ACG1H150FT" CAPC_0603#1 66.6,42.7 r0 top value=15pF (schematic designator C39)
C39_U_band_pass_diff_filter3 "KGM15ACG1H150FT" CAPC_0603#1 66.6,58.7 r0 top value=15pF (schematic designator C39)
C39_U_band_pass_diff_filter4 "KGM15ACG1H150FT" CAPC_0603#1 66.6,78.7 r0 top value=15pF (schematic designator C39)
C40_U_band_pass_diff_filter1 "C0603C131F5GACTU" CAPC_0603#1 54.2,22.7 r180 top value=130pF (schematic designator C40)
C40_U_band_pass_diff_filter2 "C0603C131F5GACTU" CAPC_0603#1 54.2,42.7 r180 top value=130pF (schematic designator C40)
C40_U_band_pass_diff_filter3 "C0603C131F5GACTU" CAPC_0603#1 54.2,58.7 r180 top value=130pF (schematic designator C40)
C40_U_band_pass_diff_filter4 "C0603C131F5GACTU" CAPC_0603#1 54.2,78.7 r180 top value=130pF (schematic designator C40)
C41_U_band_pass_diff_filter1 "MSAST105SB5104MFNA01" CAPC_0402 51.7,22.5 r180 top value=0.1uF (schematic designator C41)
C41_U_band_pass_diff_filter2 "MSAST105SB5104MFNA01" CAPC_0402 51.7,42.5 r180 top value=0.1uF (schematic designator C41)
C41_U_band_pass_diff_filter3 "MSAST105SB5104MFNA01" CAPC_0402 51.7,58.5 r180 top value=0.1uF (schematic designator C41)
C41_U_band_pass_diff_filter4 "MSAST105SB5104MFNA01" CAPC_0402 51.7,78.5 r180 top value=0.1uF (schematic designator C41)
C42_U_band_pass_diff_filter1 "MSAST105SB5104MFNA01" CAPC_0402 39.9,21.5 r0 top value=0.1uF (schematic designator C42)
C42_U_band_pass_diff_filter2 "MSAST105SB5104MFNA01" CAPC_0402 39.9,41.5 r0 top value=0.1uF (schematic designator C42)
C42_U_band_pass_diff_filter3 "MSAST105SB5104MFNA01" CAPC_0402 39.9,57.5 r0 top value=0.1uF (schematic designator C42)
C42_U_band_pass_diff_filter4 "MSAST105SB5104MFNA01" CAPC_0402 39.9,77.5 r0 top value=0.1uF (schematic designator C42)
C43_U_band_pass_diff_filter1 "C0402C221J3GACTU" CAPC_0603#1 71.3,23.5 r90 top value=200pF (schematic designator C43)
C43_U_band_pass_diff_filter2 "C0402C221J3GACTU" CAPC_0603#1 71.3,43.5 r90 top value=200pF (schematic designator C43)
C43_U_band_pass_diff_filter3 "C0402C221J3GACTU" CAPC_0603#1 71.3,59.5 r90 top value=200pF (schematic designator C43)
C43_U_band_pass_diff_filter4 "C0402C221J3GACTU" CAPC_0603#1 71.3,79.5 r90 top value=200pF (schematic designator C43)
C44_U_band_pass_diff_filter1 "CC0603JRX7R7BB105" CAPC_0603#1 56,15.8 r0 top value=1uF (schematic designator C44)
C44_U_band_pass_diff_filter2 "CC0603JRX7R7BB105" CAPC_0603#1 56,35.8 r0 top value=1uF (schematic designator C44)
C44_U_band_pass_diff_filter3 "CC0603JRX7R7BB105" CAPC_0603#1 56,51.8 r0 top value=1uF (schematic designator C44)
C44_U_band_pass_diff_filter4 "CC0603JRX7R7BB105" CAPC_0603#1 56,71.8 r0 top value=1uF (schematic designator C44)
C45_U_band_pass_diff_filter1 "CC0603JRX7R7BB105" CAPC_0603#1 41.6,15.8 r0 top value=1uF (schematic designator C45)
C45_U_band_pass_diff_filter2 "CC0603JRX7R7BB105" CAPC_0603#1 41.6,35.8 r0 top value=1uF (schematic designator C45)
C45_U_band_pass_diff_filter3 "CC0603JRX7R7BB105" CAPC_0603#1 41.6,51.8 r0 top value=1uF (schematic designator C45)
C45_U_band_pass_diff_filter4 "CC0603JRX7R7BB105" CAPC_0603#1 41.6,71.8 r0 top value=1uF (schematic designator C45)
C46_U_MIC_connection1 "KGM05ACG1H101FH" CAPC_0402 8.3,16.8 r90 top value=100pF (schematic designator C46)
C46_U_MIC_connection2 "KGM05ACG1H101FH" CAPC_0402 8.3,34.8 r90 top value=100pF (schematic designator C46)
C46_U_MIC_connection3 "KGM05ACG1H101FH" CAPC_0402 8.3,52.8 r90 top value=100pF (schematic designator C46)
C46_U_MIC_connection4 "KGM05ACG1H101FH" CAPC_0402 8.3,70.8 r90 top value=100pF (schematic designator C46)
C47 "C0603C225K4PAC" CAPC_0603#1 83.175,47.2 r180 top value=2.2uF
C48 "C0603C225K4PAC" CAPC_0603#1 81.9,64.5 r0 top value=2.2uF
C49 "C0603C225K4PAC" CAPC_0603#1 85,65.325 r270 top value=2.2uF
C50 "EMK212BJ106KG-T" CAPC_0805 81.9,62.7 r180 top value=10uF
C51 "C0603C225K4PAC" CAPC_0603#1 86.5,63.675 r90 top value=2.2uF
C52 "C0603C225K4PAC" CAPC_0603#1 85.6,48 r270 top value=2.2uF
C53 "C0603C225K4PAC" CAPC_0603#1 88,63.675 r90 top value=2.2uF
C54 "EDK107M035S9HAA" CAPE_6.3R_7.7H 83,6 r270 top value=100uF
C55 "CL21A226MAYNNNE" CAPC_0805 77.2,9.4 r180 top value=22uF
C56 "CL21A226MAYNNNE" CAPC_0805 77.2,4.8 r0 top value=22uF
C57 "MSAST105SB5104MFNA01" CAPC_0402 102.4,16 r270 top value=0.1uF
C58 "C0603C225K4PAC" CAPC_0603#1 96.8,15.8 r90 top value=2.2uF
C59 "CL21A226MAYNNNE" CAPC_0805 99.4,23.2 r180 top value=22uF
C60 "EDK107M035S9HAA" CAPE_6.3R_7.7H 91,6 r270 top value=100uF
C61 "MSAST105SB5104MFNA01" CAPC_0402 91.9,27.8 r0 top value=0.1uF
C62 "EMK212BJ106KG-T" CAPC_0805 99.4,25.2 r0 top value=10uF
C63 "C0402C153K4RAC" CAPC_0402 95.6,27.6 r270 top value=15nF
C64 "EMK212BJ106KG-T" CAPC_0805 94.7,30.1 r180 top value=10uF
C65 "MSAST105SB5104MFNA01" CAPC_0402 105.5,28.6 r270 top value=0.1uF
C66 "MSAST105SB5104MFNA01" CAPC_0402 101.4,90.5 r0 top value=0.1uF
C67 "MSAST105SB5104MFNA01" CAPC_0402 91,88.1 r0 top value=0.1uF
C68 "C0603C225K4PAC" CAPC_0603#1 118.8,18.525 r270 top value=2.2uF
C69 "C0603C225K4PAC" CAPC_0603#1 115.8,18.525 r90 top value=2.2uF
C70 "EDK107M035S9HAA" CAPE_6.3R_7.7H 116.5,13 r180 top value=100uF
C71 "C0603C225K4PAC" CAPC_0603#1 118.3,27.9 r270 top value=2.2uF
C72 "C0603C225K4PAC" CAPC_0603#1 115.5,29.8 r180 top value=2.2uF
C73 "C0603C225K4PAC" CAPC_0603#1 121.2,27.1 r0 top value=2.2uF
C74 "C0603C225K4PAC" CAPC_0603#1 116,22.3 r180 top value=2.2uF
C75 "MSAST105SB5104MFNA01" CAPC_0402 80,85.2 r0 top value=0.1uF
C76 "EMK212BJ106KG-T" CAPC_0805 120.8,78 r0 top value=10uF
C77 "EMK212BJ106KG-T" CAPC_0805 128.7,17.4 r180 top value=10uF
C78 "EMK212BJ106KG-T" CAPC_0805 123.3,19.4 r0 top value=10uF
C79 "EMK212BJ106KG-T" CAPC_0805 123.3,21.4 r0 top value=10uF
C80 "EMK212BJ106KG-T" CAPC_0805 128.7,19.4 r180 top value=10uF
C81 "CL21A226MAYNNNE" CAPC_0805 129.5,29.2 r90 top value=22uF
C82 "CL21A226MAYNNNE" CAPC_0805 141.5,82.2 r270 top value=22uF
C83 "CL21A226MAYNNNE" CAPC_0805 127.5,29.2 r90 top value=22uF
C84 "CL21A226MAYNNNE" CAPC_0805 125.5,29.2 r90 top value=22uF
C85 "CL21A226MAYNNNE" CAPC_0805 145.5,82.2 r270 top value=22uF
C86 "CL21A226MAYNNNE" CAPC_0805 143.5,82.2 r270 top value=22uF
C87 "C0402C222J3GACTU" CAPC_0402 141.1,23.15 r90 top value=2.2nF
C88 "C0402C222J3GACTU" CAPC_0402 145.5,23.15 r270 top value=2.2nF
C89 "CC0603JRX7R7BB105" CAPC_0603#2 144.4,15.85 r90 top value=1uF
C90 "C0402C153K4RAC" CAPC_0402 141.1,20.75 r270 top value=15nF
C91 "EMK212BJ106KG-T" CAPC_0805 121.9,35.3 r0 top value=10uF
C92_U_double_single_to_diff_conv1 "GJM1555C1H2R0CB01J" CAPC_0402 28.8,37.7 r180 top value=2pF (schematic designator C92)
C92_U_double_single_to_diff_conv2 "GJM1555C1H2R0CB01J" CAPC_0402 28.8,73.7 r180 top value=2pF (schematic designator C92)
C93_U_double_single_to_diff_conv1 "GJM1555C1H2R0CB01J" CAPC_0402 26.1,34.3 r90 top value=2pF (schematic designator C93)
C93_U_double_single_to_diff_conv2 "GJM1555C1H2R0CB01J" CAPC_0402 26.1,70.3 r90 top value=2pF (schematic designator C93)
C94_U_double_single_to_diff_conv1 "GJM1555C1H2R0CB01J" CAPC_0402 26.1,29.7 r270 top value=2pF (schematic designator C94)
C94_U_double_single_to_diff_conv2 "GJM1555C1H2R0CB01J" CAPC_0402 26.1,65.7 r270 top value=2pF (schematic designator C94)
C95_U_double_single_to_diff_conv1 "GJM1555C1H2R0CB01J" CAPC_0402 28.8,26.3 r180 top value=2pF (schematic designator C95)
C95_U_double_single_to_diff_conv2 "GJM1555C1H2R0CB01J" CAPC_0402 28.8,62.3 r180 top value=2pF (schematic designator C95)
C96 "GJM1555C1H2R0CB01J" CAPC_0402 115.5,28.4 r180 top value=2pF
C97 "GJM1555C1H2R0CB01J" CAPC_0402 121.2,25.7 r0 top value=2pF
D1_U_MIC_connection1 "1N4148WS-E3-18" DIOC_SOD323_P 9.4,12.8 r0 top (schematic designator D1)
D1_U_MIC_connection2 "1N4148WS-E3-18" DIOC_SOD323_P 9.4,30.8 r0 top (schematic designator D1)
D1_U_MIC_connection3 "1N4148WS-E3-18" DIOC_SOD323_P 9.4,48.8 r0 top (schematic designator D1)
D1_U_MIC_connection4 "1N4148WS-E3-18" DIOC_SOD323_P 9.4,66.8 r0 top (schematic designator D1)
D2_U_MIC_connection1 "D12V0L1B2LP-7B" DIOC_DFN-1006-2 11.2,27.145 r90 top (schematic designator D2)
D2_U_MIC_connection2 "D12V0L1B2LP-7B" DIOC_DFN-1006-2 11.2,45.145 r90 top (schematic designator D2)
D2_U_MIC_connection3 "D12V0L1B2LP-7B" DIOC_DFN-1006-2 11.2,63.145 r90 top (schematic designator D2)
D2_U_MIC_connection4 "D12V0L1B2LP-7B" DIOC_DFN-1006-2 11.2,81.145 r90 top (schematic designator D2)
D3_U_MIC_connection1 "D12V0L1B2LP-7B" DIOC_DFN-1006-2 11.2,18.955 r270 top (schematic designator D3)
D3_U_MIC_connection2 "D12V0L1B2LP-7B" DIOC_DFN-1006-2 11.2,36.955 r270 top (schematic designator D3)
D3_U_MIC_connection3 "D12V0L1B2LP-7B" DIOC_DFN-1006-2 11.2,54.955 r270 top (schematic designator D3)
D3_U_MIC_connection4 "D12V0L1B2LP-7B" DIOC_DFN-1006-2 11.2,72.955 r270 top (schematic designator D3)
D4_U_MIC_connection1 "D12V0L1B2LP-7B" DIOC_DFN-1006-2 11.2,24.245 r90 top (schematic designator D4)
D4_U_MIC_connection2 "D12V0L1B2LP-7B" DIOC_DFN-1006-2 11.2,42.245 r90 top (schematic designator D4)
D4_U_MIC_connection3 "D12V0L1B2LP-7B" DIOC_DFN-1006-2 11.2,60.245 r90 top (schematic designator D4)
D4_U_MIC_connection4 "D12V0L1B2LP-7B" DIOC_DFN-1006-2 11.2,78.245 r90 top (schematic designator D4)
D5 "BZT52H-C3V3,115" DIOC_SOD-123F-2 20,84 r0 top
D6 "PESD3V3V1BLYL" DIOC_DFN-1006-2 82.6,28.8 r90 top
D7 "KG EELP41.22-PHRH-35-A8J8-20-R18" DIOC_0603_LED 115.2,5.2 r270 top
D8 "PESD3V3V1BLYL" DIOC_DFN-1006-2 85.2,33.2 r90 top
D9 "PESD3V3V1BLYL" DIOC_DFN-1006-2 88.055,27.8 r0 top
D10 "PESD3V3V1BLYL" DIOC_DFN-1006-2 83.9,31.1 r90 top
D11 "PESD3V3V1BLYL" DIOC_DFN-1006-2 86.4,31.1 r90 top
D12 "PESD3V3V1BLYL" DIOC_DFN-1006-2 89.9,27.8 r180 top
D13 "PESD4USB5B-TBSX" DIOC_DFN-2510A-10 92.25,90.4 r180 top
D14 "P4SMAJ12A" DIOC_DO-214AC 112.6,4.4 r90 top
D15 "P4SMAJ5.0A" DIOC_DO-214AC 134.1,4.4 r90 top
D16 "KG EELP41.22-PHRH-35-A8J8-20-R18" DIOC_0603_LED 136.7,5.2 r270 top
D17 "KB EELP41.12-P1R2-36-3X4X-5-R18" DIOC_0603_LED 83,95 r90 top
D18 "KB EELP41.12-P1R2-36-3X4X-5-R18" DIOC_0603_LED 81,95 r90 top
D19 "KB EELP41.12-P1R2-36-3X4X-5-R18" DIOC_0603_LED 79,95 r90 top
D20 "KB EELP41.12-P1R2-36-3X4X-5-R18" DIOC_0603_LED 77,95 r90 top
D21 "BZT52H-C3V3,115" DIOC_SOD-123F-2 20,52 r0 top
D22 "BZT52H-C3V3,115" DIOC_SOD-123F-2 20,48 r0 top
D23 "BZT52H-C3V3,115" DIOC_SOD-123F-2 20,16 r0 top
D24 "PMEG3030EXEX" DIOC_SOD123HP-2 107.7,10.2 r0 top
DES1 "Solder pad number designator" DES_NUMBER 59.8,8.6 r270 top
F1 "BBPY00160808471Y00" FERC_0603 117.3,18.525 r270 top
F2 "MFBM1V1608-151-R" FERC_0603 104.1,25.7 r270 top
J1_U_MIC_connection1 "SJ3-35063AG" CONT_SJ3-35063AG -1.25,23 r0 top (schematic designator J1)
J1_U_MIC_connection2 "SJ3-35063AG" CONT_SJ3-35063AG -1.25,41 r0 top (schematic designator J1)
J1_U_MIC_connection3 "SJ3-35063AG" CONT_SJ3-35063AG -1.25,59 r0 top (schematic designator J1)
J1_U_MIC_connection4 "SJ3-35063AG" CONT_SJ3-35063AG -1.25,77 r0 top (schematic designator J1)
J2 "20021521-00014C1LF" CONS_20021521-00014C1LF 86.41,23.5 r0 top
J3 "43650-0300" CONT_43650-0300 104,7.125 r0 top
J4 "43650-0200" CONT_43650-0200 128.5,7.125 r0 top
J6 "74991104403" CONT_74991104403 117,90 r180 top locked
J7 "USB4105-GF-A-120" CONT_USB4105-GF-A-120 92.5,95.7 r180 top
JM1 "LSHM-150-04.0-L-DV-A-S-TR" CONS_LSHM-150-04.0-L-DV-A-S-TR 113,73 r0 top locked
JM2 "LSHM-150-04.0-L-DV-A-S-TR" CONS_LSHM-150-04.0-L-DV-A-S-TR 113,41 r0 top locked
JM3 "LSHM-130-04.0-L-DV-A-S-K-TR" CONS_LSHM-130-04.0-L-DV-A-S-TR 134,57 r90 top locked
L1 "MAMK2520H2R2M" IND_1008 77.2,7.1 r180 top
L2 "IHLE2020CDER150M51" IND_2020_S 105.6,20.6 r0 top
MH1 "Mount Hole" MT_M3 142.5,92.5 r0 top locked
MH2 "Mount Hole" MT_M3 142.5,7.5 r0 top locked
MH3 "Mount Hole" MT_M3 7.5,92.5 r0 top locked
MH4 "Mount Hole" MT_M3 7.5,7.5 r0 top locked
MH5 "Mount Hole" MT_M3 91,74 r0 top locked
MH6 "Mount Hole" MT_M3 91,40 r0 top locked
MH7 "Mount Hole" MT_M3 135,40 r0 top locked
MH8 "Mount Hole" MT_M3 135,74 r0 top locked
NRST "EVQ-P7A01P" SWS_EVQP7A 81,32.8 r270 top
PG "Test Pad" TP_1mm 138.5,11 r270 top
PWR_M1 "Test Pad" TP_1mm 131.2,90.4 r0 top
PWR_M2 "Test Pad" TP_1mm 131.2,92.4 r90 top
PWR_M3 "Test Pad" TP_1mm 131.2,94.4 r0 top
R1_U_MIC_connection1 "AC0402DR-0710KL" RESC_0402 12.4,24.15 r270 top value=10kR (schematic designator R1)
R1_U_MIC_connection2 "AC0402DR-0710KL" RESC_0402 12.4,42.15 r270 top value=10kR (schematic designator R1)
R1_U_MIC_connection3 "AC0402DR-0710KL" RESC_0402 12.4,60.15 r270 top value=10kR (schematic designator R1)
R1_U_MIC_connection4 "AC0402DR-0710KL" RESC_0402 12.4,78.15 r270 top value=10kR (schematic designator R1)
R2_U_MIC_connection1 "AC0402DR-0710KL" RESC_0402 12.4,19.05 r90 top value=10kR (schematic designator R2)
R2_U_MIC_connection2 "AC0402DR-0710KL" RESC_0402 12.4,37.05 r90 top value=10kR (schematic designator R2)
R2_U_MIC_connection3 "AC0402DR-0710KL" RESC_0402 12.4,55.05 r90 top value=10kR (schematic designator R2)
R2_U_MIC_connection4 "AC0402DR-0710KL" RESC_0402 12.4,73.05 r90 top value=10kR (schematic designator R2)
R3_U_MIC_connection1 "AC0603FR-7W2K2L" RESC_0603 6.75,14.5 r0 top value=2.2kR (schematic designator R3)
R3_U_MIC_connection2 "AC0603FR-7W2K2L" RESC_0603 6.75,32.5 r0 top value=2.2kR (schematic designator R3)